# Altium PCB PY32E407Vx_START_ETH.PcbDoc (part 1 of 4)
Units mil, origin at the board's own origin, x right, y up, seen from the top; angles counter-clockwise.
Board outline 5249.65 x 2929.38 mil, 4 copper layers (Top Layer, GND, POWER, Bottom Layer); 253 components, 243 nets, 969 pads, 637 vias.
Unrouted connection lines stored in the file: 88.
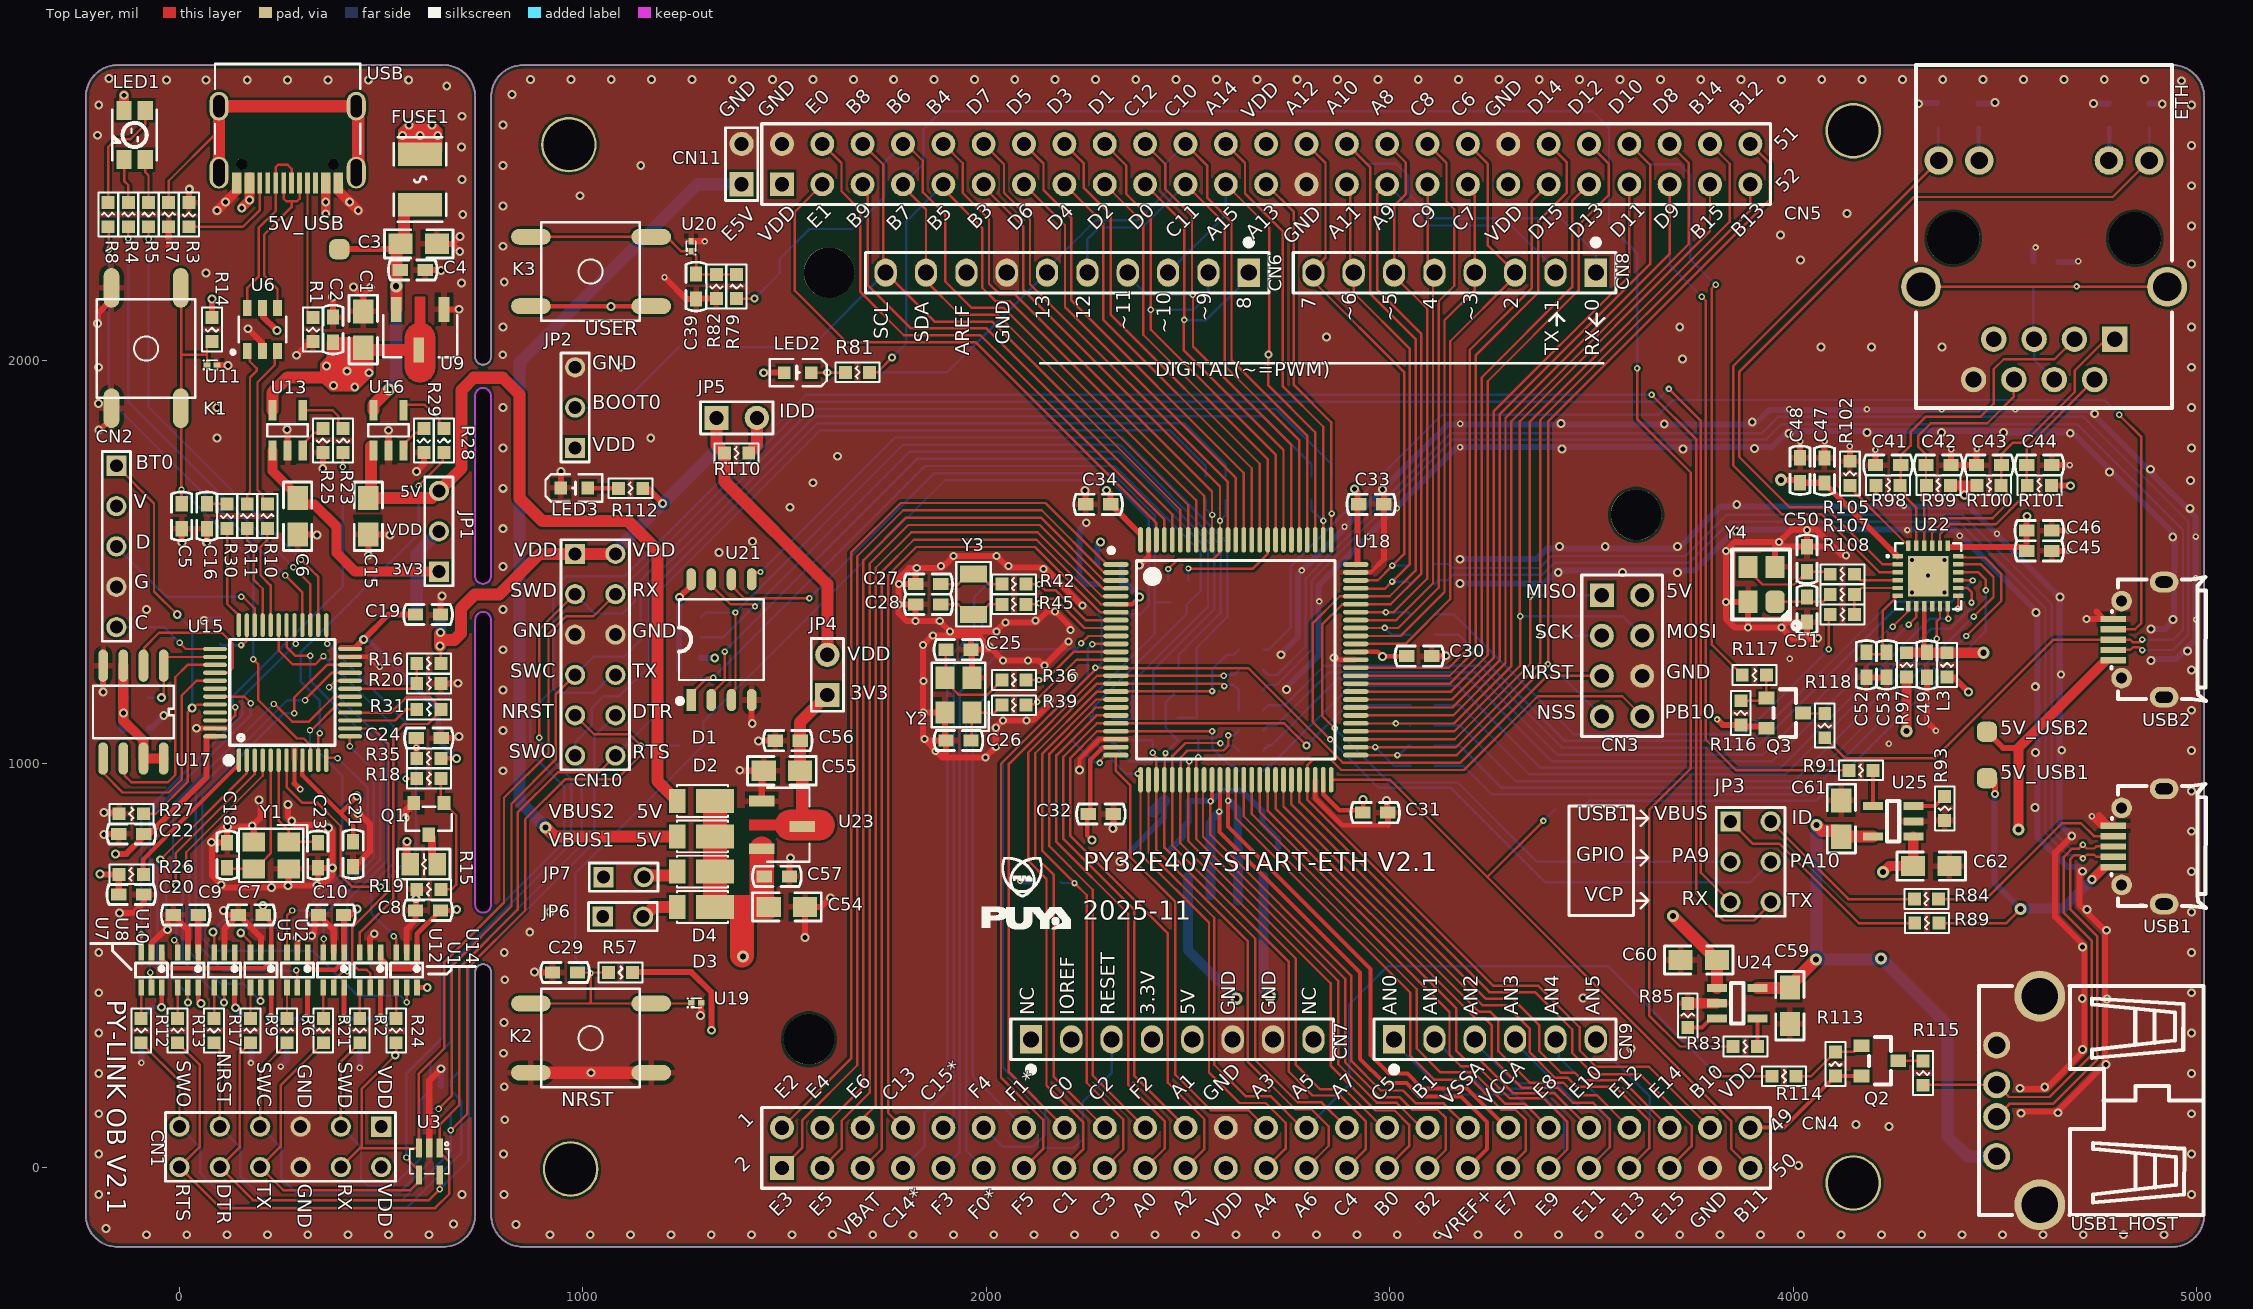
[diagram p0: Top Layer view]
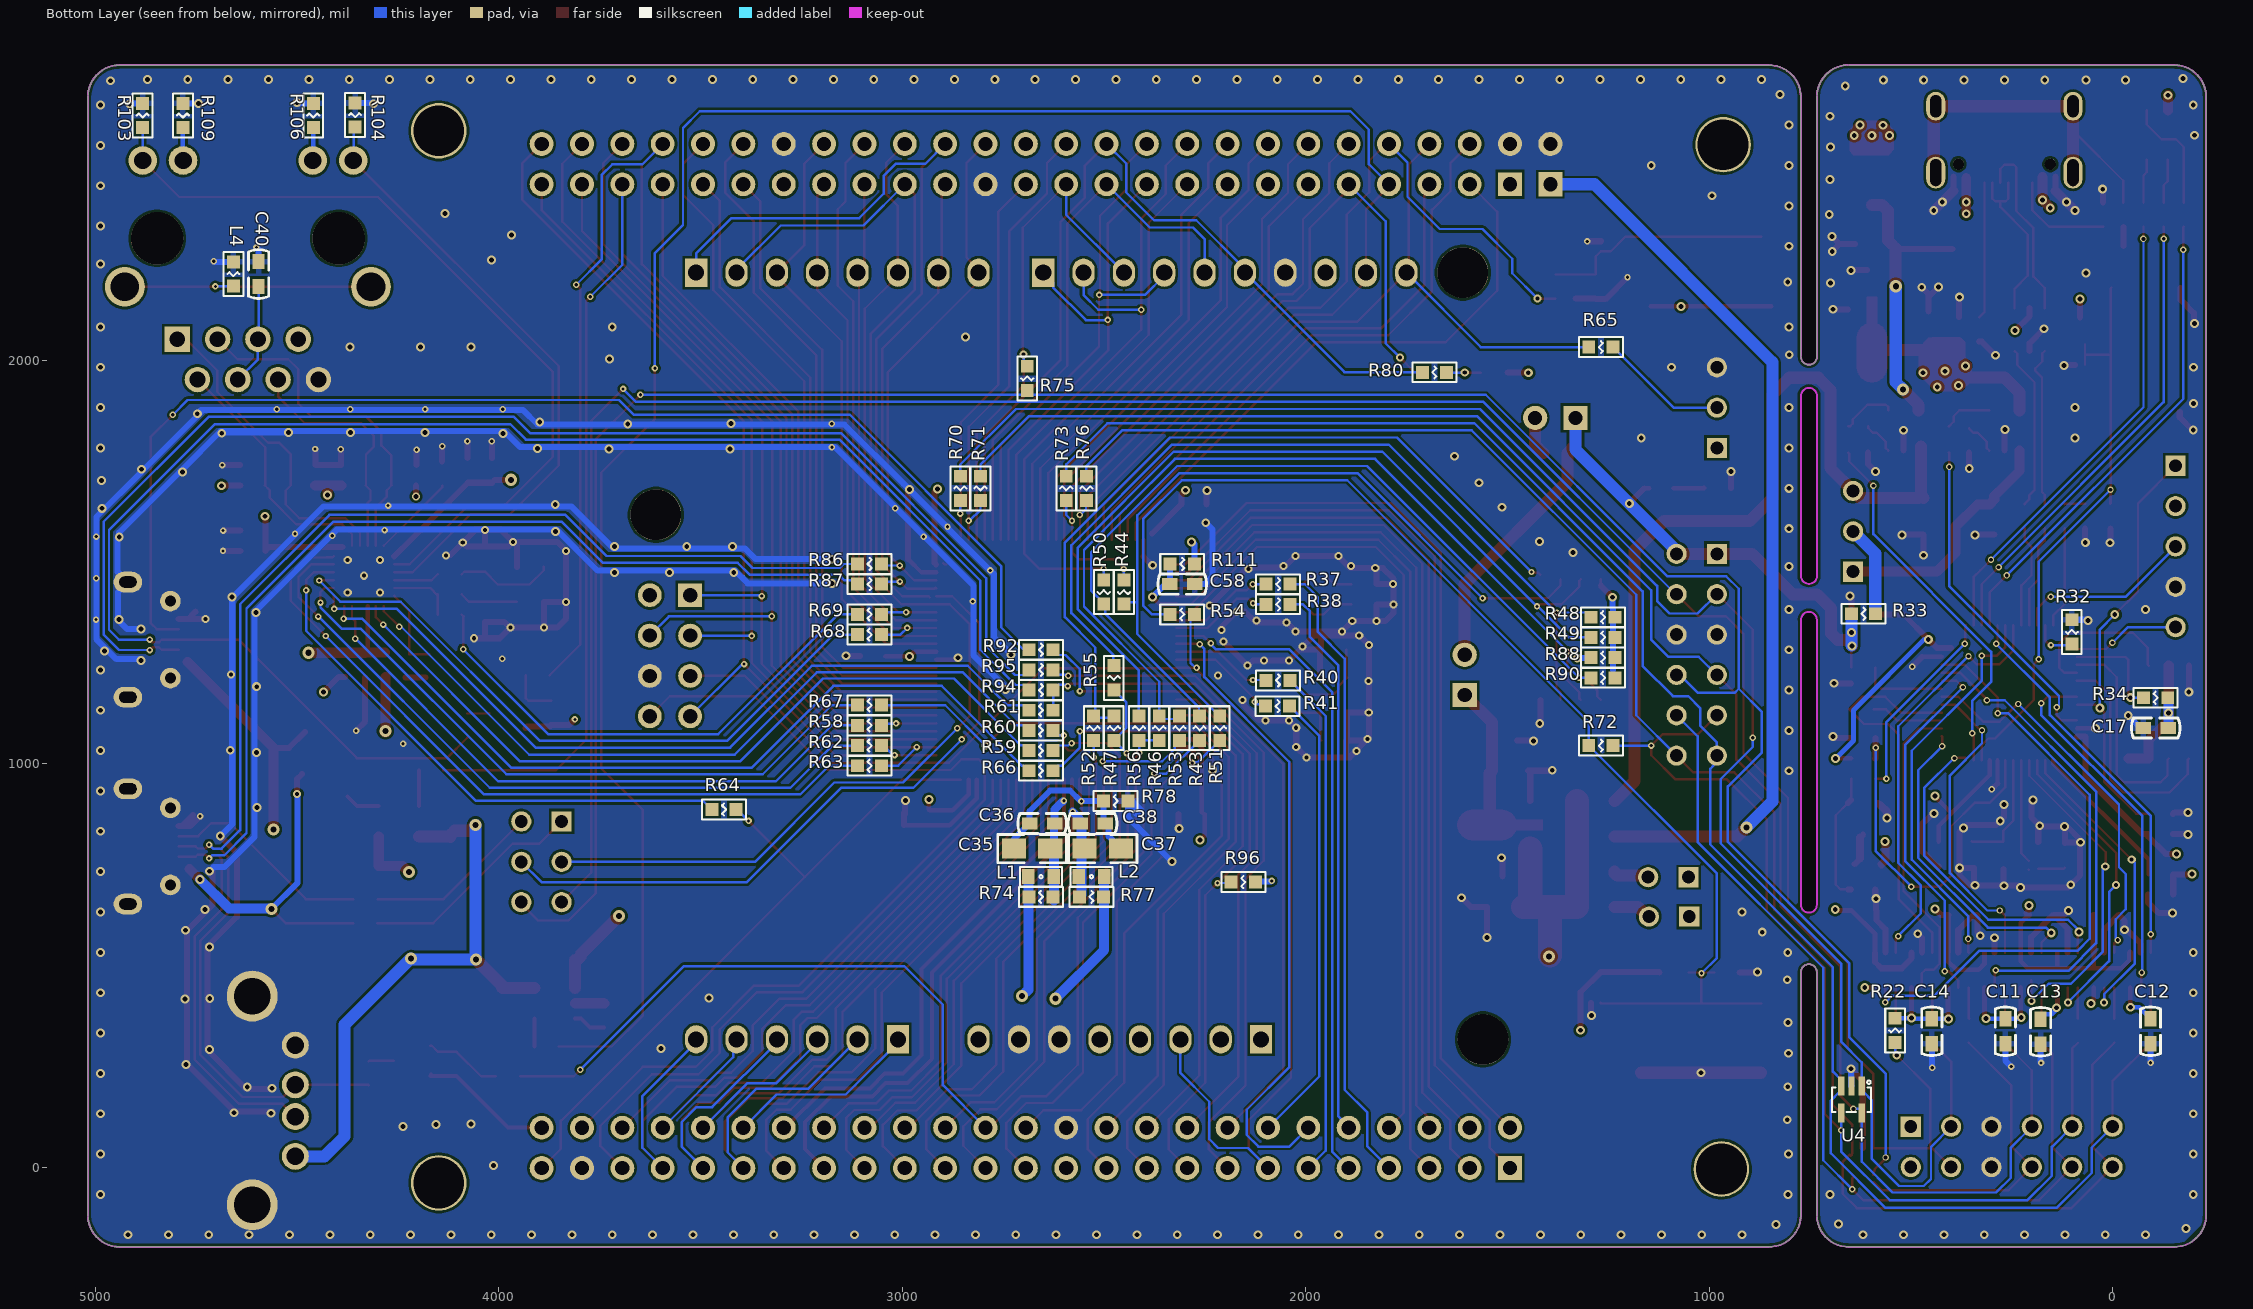
[diagram p1: Bottom Layer view, seen from below]
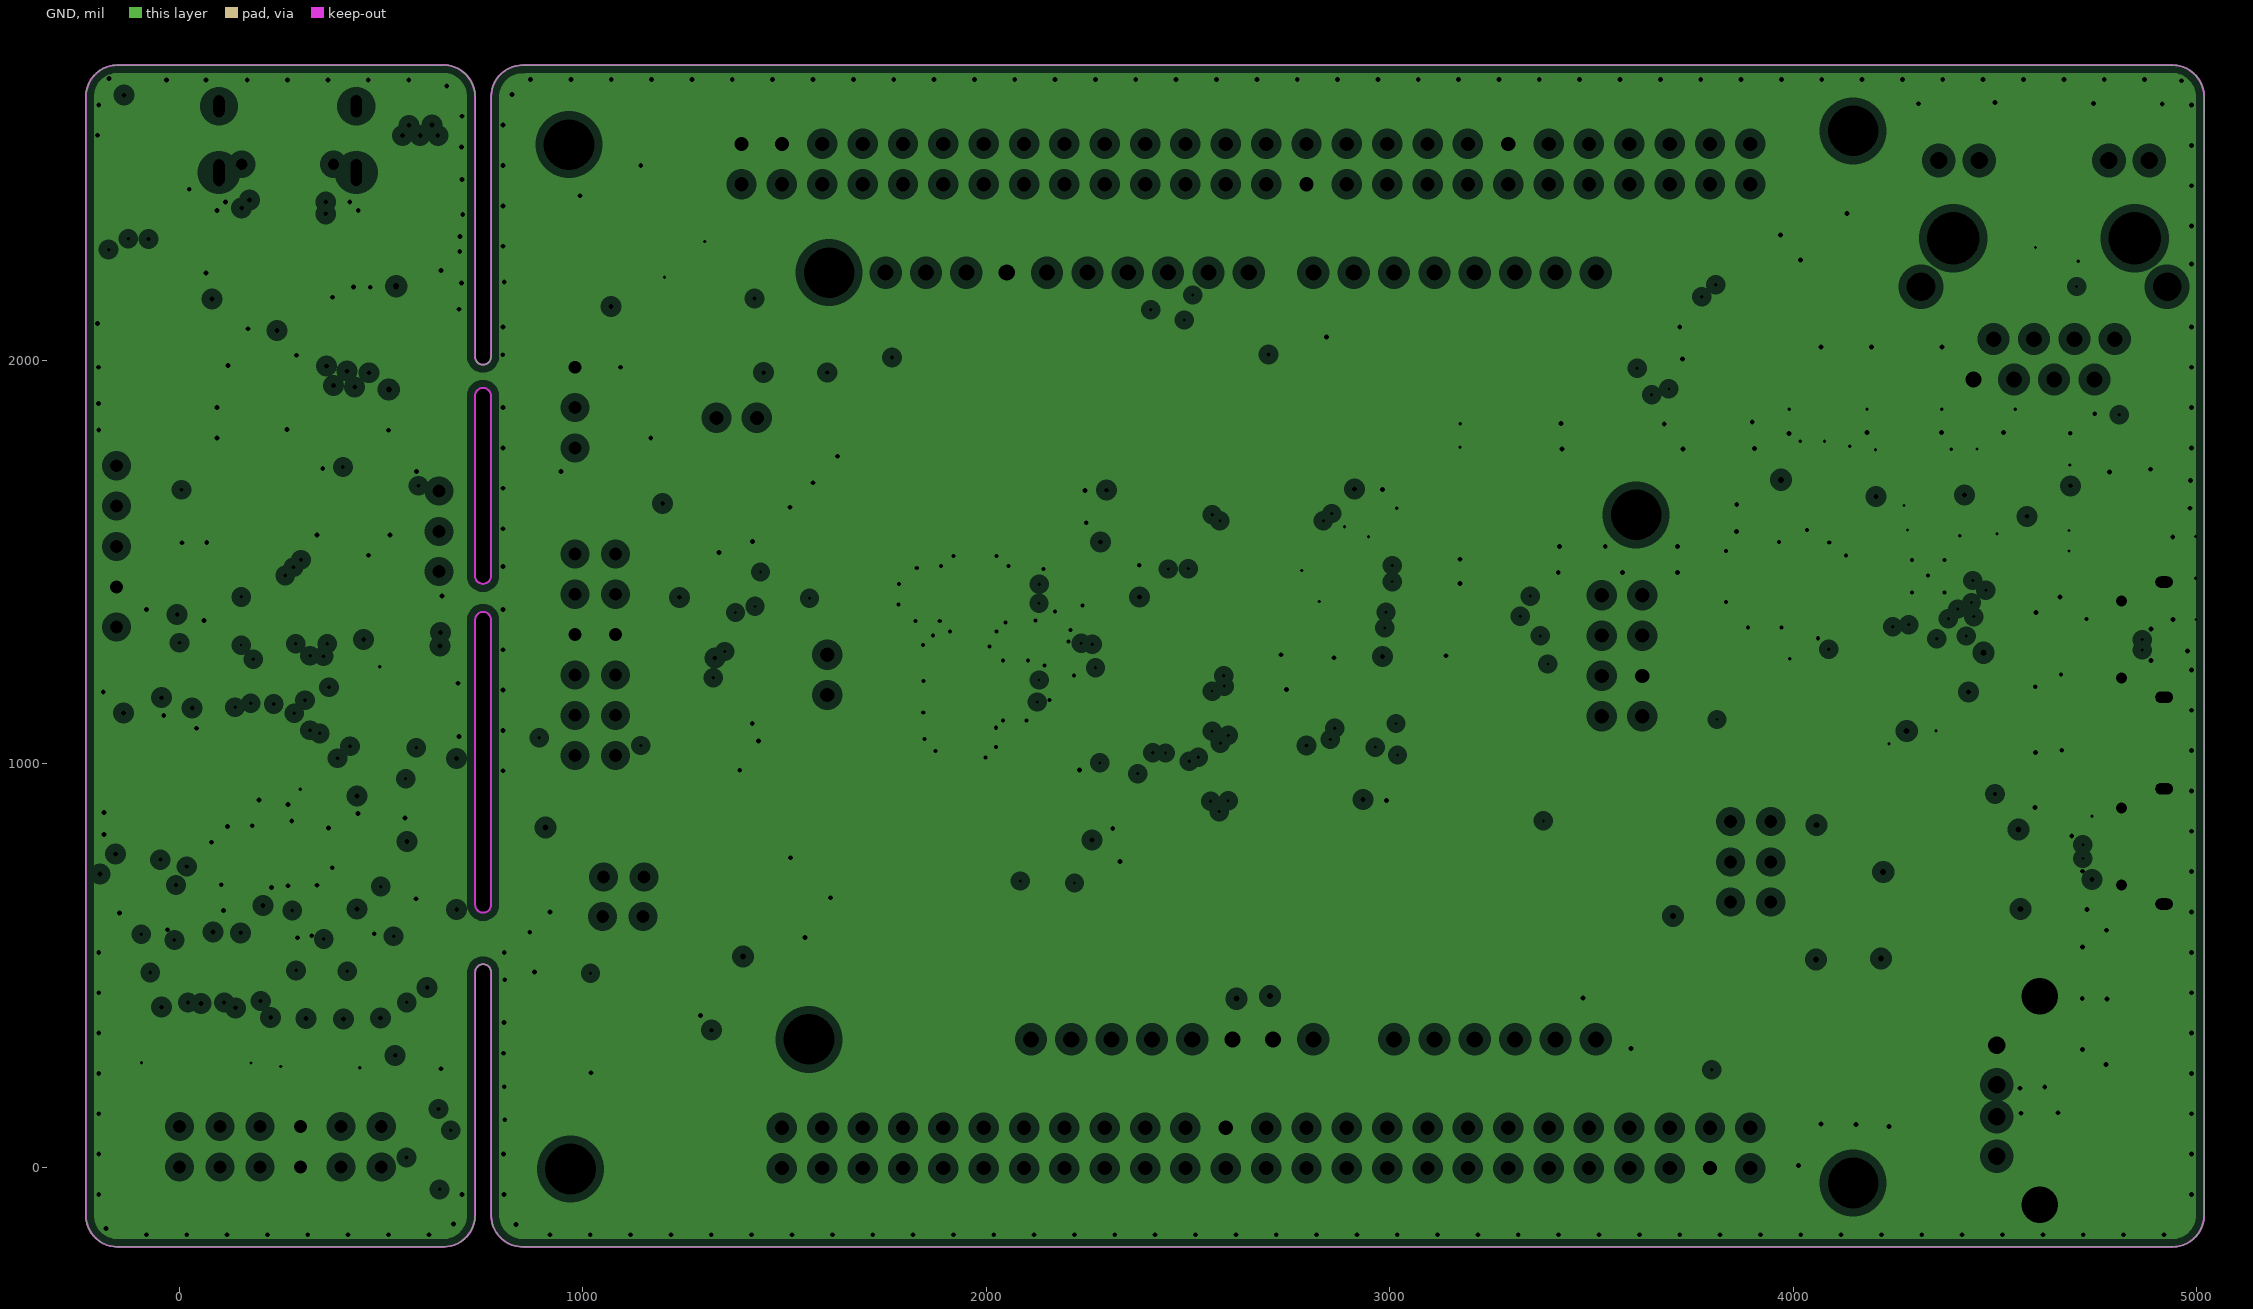
[diagram p2: GND, clearances drawn from the general rule]
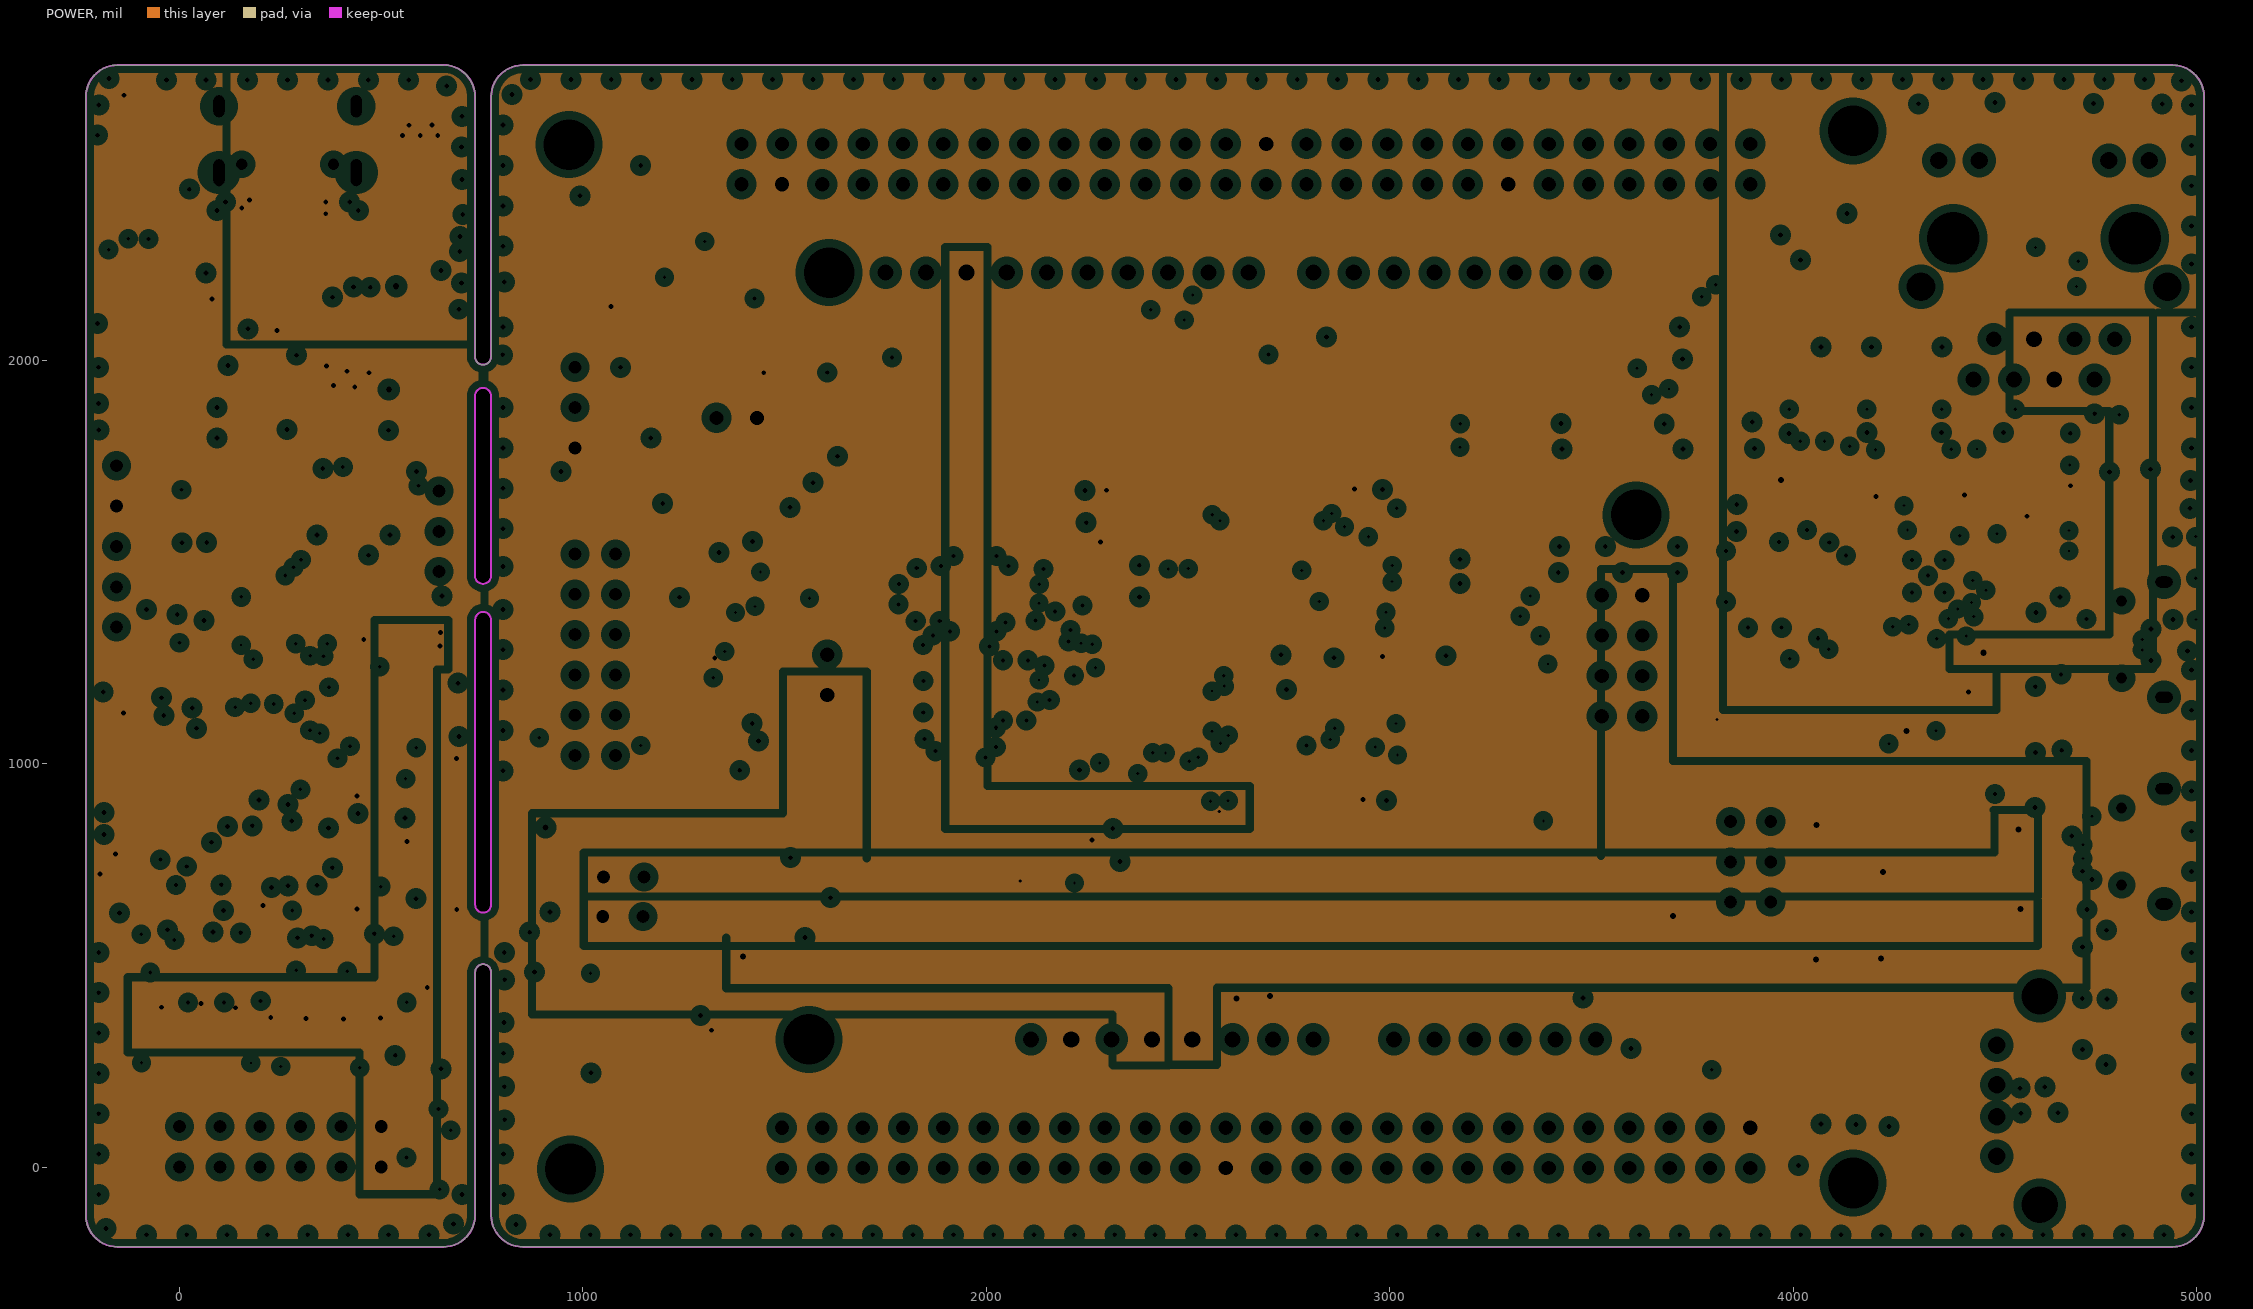
[diagram p3: POWER, clearances drawn from the general rule]

## Layer stack, top to bottom
Top Solder: solder mask 0.4, Solder Resist, Dk 3.5
Top Layer: signal copper 1.4
Dielectric 2: prepreg 12.6, PP-006, Dk 4.1
GND: plane copper 1.378, net GND
Dielectric5: dielectric 12.6, FR-4, Dk 4.8
POWER: plane copper 1.378, net (Multiple Nets)
Dielectric4: dielectric 12.6, FR-4, Dk 4.8
Bottom Layer: signal copper 1.4
Bottom Solder: solder mask 0.4, Solder Resist, Dk 3.5

## Board outline
-153.26,-198 653.78,-198 653.81,-197.97 ccw(c653.81,-119.23) 732.55,-119.23 732.57,-118.95 732.57,483.05 732.92,483.05 cw(c752.61,483.05) 772.29,483.05 772.29,-119.17 772.35,-119.17 ccw(c851.09,-119.17) 851.09,-197.91 851.09,-198 4938.87,-198 ccw(c4938.87,-119.26) 5017.61,-119.26 5017.65,-119.26 5017.65,2652.35 5017.45,2652.35 ccw(c4938.71,2652.35) 4938.71,2731.09 850.95,2731.09 850.95,2730.69 ccw(c850.95,2651.95) 772.21,2651.95 772.21,2008.35 771.94,2008.08 cw(c752.25,2008.08) 732.57,2008.08 732.57,2652.64 ccw(c653.83,2652.64) 653.83,2731.38 653.83,2731.09 -153.26,2731.09 ccw(c-153.26,2652.35) -232,2652.35 -232,-119.26 ccw(c-153.26,-119.26)
cut-out: 732.92,650.05 ccw(c752.61,650.05) 772.29,650.05 771.94,650.05 771.94,1356.05 772.29,1356.05 ccw(c752.61,1356.05) 732.92,1356.05 732.57,1357.05
cut-out: 732.57,1465.05 ccw(c752.25,1465.05) 771.94,1465.05 771.94,1911.05 ccw(c752.25,1911.05) 732.57,1911.05

## Design rules (kind name [scope] priority, off if disabled: settings)
Clearance [All] p1: gap=6 ignorepadtopadclearanceinfootprint=FALSE
ComponentClearance [All] p1 off: gap=10 collisioncheckmode=3 verticalgap=10 showdistances=FALSE
DiffPairsRouting DiffPairsRouting_2 [InDifferentialPair ('USB1')] p1: maxlimit=10 minlimit=10 mostfreqgap=10 toplayer_minwidth=15 toplayer_maxwidth=15 toplayer_prefwidth=15 bottomlayer_minwidth=15 bottomlayer_maxwidth=15 bottomlayer_prefwidth=15 maxuncoupledlength=500
DiffPairsRouting DiffPairsRouting_1 [InDifferentialPairClass('USB')] p2: maxlimit=10 minlimit=10 mostfreqgap=10 toplayer_minwidth=15 toplayer_maxwidth=15 toplayer_prefwidth=15 bottomlayer_minwidth=15 bottomlayer_maxwidth=15 bottomlayer_prefwidth=15 maxuncoupledlength=500
DiffPairsRouting DiffPair_DiffPairsRouting [All] p3: maxlimit=10 minlimit=10 mostfreqgap=10 toplayer_minwidth=15 toplayer_maxwidth=15 toplayer_prefwidth=15 bottomlayer_minwidth=15 bottomlayer_maxwidth=15 bottomlayer_prefwidth=15 maxuncoupledlength=500
DiffPairsRouting [All] p4: maxlimit=10 minlimit=10 mostfreqgap=10 toplayer_minwidth=15 toplayer_maxwidth=15 toplayer_prefwidth=15 bottomlayer_minwidth=15 bottomlayer_maxwidth=15 bottomlayer_prefwidth=15 maxuncoupledlength=500
HoleSize [All] p1: absolutevalues=TRUE maxlimit=300 minlimit=1 maxpercent=80.000 minpercent=20.000
HoleSize Testpoint [All] p2: absolutevalues=TRUE maxlimit=100 minlimit=1 maxpercent=80.000 minpercent=20.000
HoleSize TestPointUsage [All] p3: absolutevalues=TRUE maxlimit=100 minlimit=1 maxpercent=80.000 minpercent=20.000
MinimumSolderMaskSliver [All] p1: minsoldermaskwidth=0
PlaneClearance [All] p1: clearance=20
PlaneConnect [All] p1: planeconnectstyle=Direct reliefexpansion=20 reliefentries=4 reliefconductorwidth=10 reliefairgap=10
PolygonConnect "Polygon VIA" [IsVia] p1: connectstyle=Direct reliefconductorwidth=10 reliefentries=4 polygonreliefangle="90 Angle" airgapwidth=10
PolygonConnect [All] p2: thpad.connectstyle=Direct thpad.reliefconductorwidth=10 thpad.reliefentries=4 thpad.polygonreliefangle="90 Angle" thpad.airgapwidth=10 smdpad.connectstyle=Relief smdpad.reliefconductorwidth=15 smdpad.reliefentries=4 smdpad.polygonreliefangle="90 Angle" smdpad.airgapwidth=10 via.connectstyle=Direct via.reliefconductorwidth=10 via.reliefentries=4 via.polygonreliefangle="90 Angle" via.airgapwidth=10
RoutingVias [All] p1: holewidth=20 width=40 viastyle="Through Hole" minholewidth=20 minwidth=40 maxholewidth=20 maxwidth=40
SilkToSilkClearance [All] p1: silktosilkclearance=0
SilkToSolderMaskClearance [IsPad] p1: minsilkscreentomaskgap=0 clearancetoexposedcopper=TRUE
SolderMaskExpansion [All] p1: expansion=4 istentingtop=FALSE
Width [All] p1: maxlimit=80 minlimit=6 preferedwidth=6
22 further rules are at their usual default settings.

## Classes and differential pairs
component class Designator: C39 C59 C60 C61 C62 K3 LED2 Q2 Q3 R82 R83 R84 R85 R86 R87 R88 R89 R90 R91 R92 R93 R94 R95 R96 R113 R114 R115 R116 R117 R118 U20 U21 U24 U25 USB1 USB1_HOST USB2
net class PF[0..5]: PF0 PF1 PF2 PF3 PF4 PF5
net class PE[0..15]: PE0 PE1 PE2 PE3 PE4 PE5 PE6 PE7 PE8 PE9 PE10 PE11 PE12 PE13 PE14 PE15
net class PD[0..15]: PD0 PD1 PD2 PD3 PD4 PD5 PD6 PD7 PD8 PD9 PD10 PD11 PD12 PD13 PD14 PD15
net class PC[0..15]: PC0 PC1 PC2 PC3 PC4 PC5 PC6 PC7 PC8 PC9 PC10 PC11 PC12 PC13 PC14 PC15
net class PB[0..15]: PB0 PB1 PB2 PB3 PB4 PB5 PB6 PB7 PB8 PB9 PB10 PB11 PB12 PB13 PB14 PB15
net class PA[0..15]: PA0 PA1 PA2 PA3 PA4 PA5 PA6 PA7 PA8 PA9 PA10 PA11 PA12 PA13 PA14 PA15

## Components (designator, comment, footprint, x,y, rotation, side; value= is the part's Value field where it differs from the comment)
5V_USB "TP_SIN" TP_SIN 396.1,2274.79 r0 top
5V_USB1 "TP_SIN" TP_SIN 4479.3,963.69 r0 top
5V_USB2 "TP_SIN" TP_SIN 4479.3,1078.69 r0 top
C1 "10uF" C0805 455.5,2075.5 r270 top
C2 "100nF" C0603 380.5,2075.5 r270 top
C3 "10uF" C0805 593,2288 r180 top
C4 "100nF" C0603 578.1,2223.2 r180 top
C5 "100nF" C0603 5.5,1613 r90 top
C6 "10uF" C0805 293,1613 r90 top
C7 "100nF" C0603 176.6,624.9 r0 top value=104
C8 "100nF" C0603 616,636.09 r0 top value=104
C9 "100nF" C0603 15.3,624.9 r0 top value=104
C10 "100nF" C0603 375.5,624.9 r0 top value=104
C11 "100nF" C0603 265.7,336.7 r90 bottom value=104
C12 "100nF" C0603 -94.3,336.6 r90 bottom value=104
C13 "100nF" C0603 178.2,335.3 r90 bottom value=104
C14 "100nF" C0603 447.9,336.7 r90 bottom value=104
C15 "10uF" C0805 468,1613 r90 top
C16 "100nF" C0603 68,1613 r90 top
C17 "100nF" C0603 -107,1088 r180 bottom value=104
C18 "22pF" C0603 118,772.6 r270 top
C19 "100nF" C0603 616,1369.3 r180 top value=104
C20 "100nF" C0603 -119.5,675.5 r180 top value=104
C21 "100nF" C0603 430.5,775.5 r90 top value=104
C22 "100nF" C0603 -119.5,825.5 r0 top value=104
C23 "22pF" C0603 343,772.6 r90 top
C24 "100nF" C0603 618,1063 r180 top value=104
C25 "22pF" C0603 1930.5,1282.09 r180 top
C26 "22pF" C0603 1930.5,1057.09 r0 top
C27 "22pF" C0603 1855.5,1444.59 r0 top
C28 "22pF" C0603 1855.5,1394.59 r0 top
C29 "100nF" C0603 955.5,482.09 r0 top
C30 "100nF" C0603 3072.8,1266.29 r180 top
C31 "100nF" C0603 2963.61,878.2 r180 top
C32 "100nF" C0603 2283.54,875.01 r180 top
C33 "100nF" C0603 2953.6,1642.49 r180 top
C34 "100nF" C0603 2276.7,1642.49 r0 top
C35 "1uF" C0805 2677.6,789.09 r180 bottom
C36 "100nF" C0603 2652.6,851.59 r180 bottom
C37 "1uF" C0805 2502.6,789.09 r0 bottom
C38 "100nF" C0603 2527.6,851.59 r0 bottom
C39 "100nF" C0603 1280.5,2182.09 r90 top
C40 "100nF" C0603 4594.5,2213.09 r270 bottom
C41 "NC/10pF" C0603 4234.4,1739.59 r0 top
C42 "NC/10pF" C0603 4359.4,1739.59 r180 top
C43 "NC/10pF" C0603 4484.4,1739.59 r0 top
C44 "NC/10pF" C0603 4609.4,1739.59 r180 top
C45 "100nF" C0603 4609,1527.09 r180 top
C46 "100nF" C0603 4609,1577.09 r180 top
C47 "10uF" C0603 4076.7,1726.19 r270 top
C48 "100nF" C0603 4016.2,1726.89 r270 top
C49 "100nF" C0603 4330.5,1244.59 r90 top
C50 "22pF" C0603 4033.5,1506.59 r90 top
C51 "22pF" C0603 4033.5,1381.59 r90 top
C52 "10uF" C0603 4180.5,1244.59 r90 top
C53 "100nF" C0603 4230.5,1244.59 r90 top
C54 "10uF" C0805 1505.5,644.59 r180 top
C55 "10uF" C0805 1493,982.09 r0 top
C56 "0.1uF/50V" C0603CAP 1476.4,1056.59 r90 top
C57 "0.1uF/50V" C0603CAP 1511.6,720.29 r270 top value=2.2uF
C58 "100nF" C0603 2305.5,1444.59 r0 bottom
C59 "10uF" C0805 3991.1,399.85 r90 top
C60 "10uF" C0805 3765.2,513.11 r0 top
C61 "10uF" C0805 4118.51,863.52 r270 top
C62 "10uF" C0805 4341.44,745.74 r180 top
CN1 "CON6x2" CON6X2 500,0 r270 top locked
CN2 "CON5" CON5 -156.37,1737.99 r270 top
CN3 "Header 4X2" HDR2X4 3525.12,1417.14 r270 top locked
CN4 "Header 25X2" HDR2X25 1493.11,-2.45 r0 top locked
CN5 "Header 25X2" HDR2X25 1493.11,2435.55 r0 top locked
CN6 "Header 10" 1*10P_FEMALE 2650.11,2216.55 r180 top locked
CN7 "Header 8" 1*8P_FEMALE 2110.11,316.55 r0 top locked
CN8 "Header 8" 1*8P_FEMALE 3510.11,2216.55 r180 top locked
CN9 "Header 6" 1*6P_FEMALE 3010.11,316.55 r0 top locked
CN10 "CON6x2" CON6X2 1080.5,1519.59 r0 top locked
CN11 "CON2" CON2#1 1393.11,2435.55 r90 top locked
D1 "DFLS130L-7" POWERDI-123_L2.8-W1.8-LS3.7-RD 1280.5,907.09 r180 top
D2 "DFLS130L-7" POWERDI-123_L2.8-W1.8-LS3.7-RD 1280.5,819.59 r180 top
D3 "DFLS130L-7" POWERDI-123_L2.8-W1.8-LS3.7-RD 1280.5,644.59 r180 top
D4 "DFLS130L-7" POWERDI-123_L2.8-W1.8-LS3.7-RD 1280.5,732.09 r180 top
ETH "HR911105A" RJ45-TH_HR911105A 4621,2223.09 r180 top locked
FUSE1 "BSMD1206-050-6V" SDM1210P005TF 618,2450.5 r270 top
JP1 "CON3" CON3 643,1475.5 r90 top
JP2 "CON3" CON3 980.5,1782.09 r90 top
JP3 "CON3x2" CON3x2 3943.61,856.41 r0 top
JP4 "CON2" CON2#1 1605.5,1169.59 r90 top
JP5 "CON2/NC" CON2#1 1330.89,1856.71 r0 top
JP6 "CON2" CON2#2 1048.91,620.65 r0 top
JP7 "CON2" CON2#2 1050.73,718.4 r0 top
K1 "1TS002B-2600-5001_key" SWITCH -82.91,2027.71 r90 top
K2 "1TS002B-2600-5001_key" SWITCH 1018,319.59 r0 top locked
K3 "1TS002B-2600-5001_key" SWITCH 1018,2219.59 r0 top locked
L1 "BEAD" L0603 2655.5,719.59 r180 bottom value=600R@100MHz
L2 "BEAD" L0603 2530.5,719.59 r0 bottom value=600R@100MHz
L3 "330@100MHz" R0603 4380.5,1244.59 r90 top
L4 "330@100MHz" R0603 4657,2213.09 r270 bottom
LED1 "MHPA3528RGBCT" LED-ARRAY-SMD_4P-L3.5-W2.8-TL -111.13,2557.84 r90 top
LED2 "GREEN" 0603_LED 1518,1969.59 r180 top
LED3 "RED" 0603_LED 993,1682.09 r0 top
Q1 "2302" SOT23 618,863 r0 top value=SI2302
Q2 "2301" "SOT23 2301" 4169,300.5 r180 top value=SI2301
Q3 "2301" "SOT23 2301" 3932.87,1162.45 r180 top value=SI2301
R1 "5.1K" R0603 330.5,2075.5 r90 top
R2 "27R" R0603 446.71,338 r270 top
R3 "5.1K" R0603 23.28,2360.25 r90 top
R4 "680R" R0603 -126.72,2360.25 r270 top
R5 "680R" R0603 -76.72,2360.25 r270 top
R6 "27R" R0603 266.14,338 r270 top
R7 "1M" R0603 -26.72,2360.25 r270 top
R8 "680R" R0603 -176.72,2360.25 r270 top
R9 "27R" R0603 175.86,338 r270 top
R10 "27R" R0603 218,1613 r270 top
R11 "27R" R0603 168,1613 r270 top
R12 "27R" R0603 -95,338 r270 top
R13 "27R" R0603 -4.71,338 r270 top
R14 "10K" R0603 80.5,2075.5 r90 top
R15 "100R" R0805 605.5,750.5 r180 top
R16 "20K" R0603 618,1248 r0 top
R17 "27R" R0603 85.57,338 r270 top
R18 "100R" R0603 618,963 r180 top
R19 "100K" R0603 618,688 r0 top
R20 "10K" R0603 618,1198 r180 top
R21 "27R" R0603 356.43,338 r270 top
R22 "4.7K" R0603 538.7,338.7 r90 bottom
R23 "4.7K" R0603 405.5,1800.5 r90 top
R24 "27R" R0603 537,338 r270 top
R25 "16K" R0603 355.5,1800.5 r90 top
R26 "0R" R0603 -119.5,725.5 r0 top
R27 "10K" R0603 -119.5,875.5 r180 top
R28 "4.7K" R0603 655.5,1800.5 r90 top
R29 "16K" R0603 605.5,1800.5 r90 top
R30 "0R" R0603 118,1613 r90 top
R31 "680R" R0603 618,1134.09 r180 top
R32 "0R" R0603 100.8,1326.39 r90 bottom
R33 "0R" R0603 617.1,1371.3 r0 bottom
R34 "100K" R0603 -107,1163 r180 bottom
R35 "10K" R0603 618,1013 r0 top
R36 "0R" R0603 2068,1207.09 r0 top
R37 "0R" R0603 2068,1444.59 r0 bottom
R38 "0R" R0603 2068,1394.59 r0 bottom
R39 "0R" R0603 2068,1144.59 r0 top
R40 "0R" R0603 2068.2,1205.99 r0 bottom
R41 "0R" R0603 2069.3,1142.19 r0 bottom
R42 "0R" R0603 2068,1444.59 r0 top
R43 "0R/NC" R0603 2262.5,1087.5 r270 bottom
R44 "0R/NC" R0603 2450,1425 r90 bottom
R45 "0R" R0603 2068,1394.59 r0 top
R46 "0R/NC" R0603 2362.5,1087.5 r270 bottom
R47 "0R/NC" R0603 2475,1087.5 r270 bottom
R48 "0R/NC" R0603 1262.5,1362.5 r180 bottom
R49 "0R/NC" R0603 1262.5,1312.5 r180 bottom
R50 "0R" R0603 2500,1425 r90 bottom
R51 "0R" R0603 2212.5,1087.5 r270 bottom
R52 "0R" R0603 2525,1087.5 r270 bottom
R53 "0R" R0603 2312.5,1087.5 r270 bottom
R54 "0R" R0603 2305.5,1369.59 r180 bottom
R55 "0R" R0603 2475,1212.5 r270 bottom
R56 "0R" R0603 2412.5,1087.5 r270 bottom
R57 "10K" R0603 1093,482.09 r180 top
R58 "0R" R0603 3080.5,1094.59 r180 bottom
R59 "0R" R0603 2655.5,1032.09 r180 bottom
R60 "0R" R0603 2655.5,1082.09 r180 bottom
R61 "0R" R0603 2655.5,1132.09 r180 bottom
R62 "0R" R0603 3080.5,1044.59 r180 bottom
R63 "0R" R0603 3080.5,994.59 r180 bottom
R64 "0R" R0603 3441.05,886.09 r180 bottom
R65 "10K" R0603 1268,2032.09 r0 bottom
R66 "0R" R0603 2655.5,982.09 r180 bottom
R67 "0R" R0603 3080.5,1144.59 r180 bottom
R68 "0R" R0603 3080.5,1319.59 r180 bottom
R69 "0R" R0603 3080.5,1369.59 r180 bottom
R70 "100R" R0603 2855.5,1682.09 r270 bottom
R71 "100R" R0603 2805.5,1682.09 r270 bottom
R72 "0R" R0603 1268,1044.59 r0 bottom
R73 "0R" R0603 2593,1682.09 r270 bottom
R74 "0R/NC" R0603 2655.5,669.59 r180 bottom
R75 "0R" R0603 2689.6,1954.69 r90 bottom
R76 "0R" R0603 2543,1682.09 r270 bottom
R77 "0R/NC" R0603 2530.5,669.59 r0 bottom
R78 "0R" R0603 2470.4,907.19 r180 bottom
R79 "0R" R0603 1380.5,2182.09 r270 top
R80 "680R/NC" R0603 1680.5,1969.59 r0 bottom
R81 "680R" R0603 1680.5,1969.59 r0 top
R82 "1.5K" R0603 1330.5,2182.09 r90 top
R83 "4.7K" R0603 3880.54,298.78 r0 top
R84 "1K" R0603 4329.46,664.12 r0 top
R85 "16K" R0603 3738.01,375.81 r270 top
R86 "22R" R0603 3080.5,1494.59 r0 bottom
R87 "22R" R0603 3080.5,1444.59 r0 bottom
R88 "0R" R0603 1262.5,1262.5 r180 bottom
R89 "10K" R0603 4330.5,604.63 r0 top
R90 "100K" R0603 1262.5,1212.5 r180 bottom
R91 "4.7K" R0603 4167.5,983.13 r0 top
R92 "1K" R0603 2655.5,1282.09 r0 bottom
R93 "16K" R0603 4374.65,888.83 r90 top
R94 "22R" R0603 2655.5,1182.09 r0 bottom
R95 "22R" R0603 2655.5,1232.09 r0 bottom
R96 "10K" R0603 2154.2,706.19 r180 bottom
R97 "0R" RES0603 4280.5,1244.59 r90 top
R98 "49.9R" R0603 4234.4,1689.59 r180 top
R99 "49.9R" R0603 4359.4,1689.59 r0 top
R100 "49.9R" R0603 4484.4,1689.59 r180 top
R101 "49.9R" R0603 4609.4,1689.59 r0 top
R102 "12.1K" R0603 4139.7,1719.09 r90 top
R103 "4.7K" R0603 4882,2606.09 r270 bottom
R104 "4.7K" R0603 4355.5,2607.09 r270 bottom
R105 "0R" R0603 4121,1469.09 r0 top
R106 "270" R0603 4459,2606.09 r270 bottom
R107 "0R" R0603 4121,1419.09 r0 top
R108 "0R" R0603 4121,1369.09 r180 top
R109 "270" R0603 4782,2606.09 r270 bottom
R110 "0R" R0603 1380.89,1769.21 r0 top
R111 "0R" R0603 2305.5,1494.59 r0 bottom
R112 "680R" R0603 1118,1682.09 r0 top
R113 "100K" R0603 4103.98,255.46 r90 top
R114 "100" R0603 3976.49,224.94 r180 top
R115 "1.5K" R0603 4321.23,232.64 r90 top
R116 "100K" R0603 3869.41,1125.67 r90 top
R117 "100" R0603 3902.98,1219.26 r180 top
R118 "1.5K" R0603 4077.51,1094 r90 top
U1 "74LVC1T45DW" SOT363 472.69,488.04 r180 top
U2 "74LVC1T45DW" SOT363 292,488.04 r180 top
U3 "ESD_6V1" ESD_SOT323-5L 619,14 r180 top value=ESDALC6V1W5
U4 "ESD_6V1" ESD_SOT323-5L 647,167 r0 bottom value=ESDALC6V1W5
U5 "74LVC1T45DW" SOT363 201.66,488.04 r180 top
U6 "USBLC6-2SC6" SOT23-6 205.5,2075.5 r180 top
U7 "74LVC1T45DW" SOT363 -69.37,488.04 r180 top
U8 "74LVC1T45DW" SOT363 20.97,488.04 r180 top
U9 "LM1117-3.3" LM1117-3.3 655.5,2125.5 r90 top
U10 "74LVC1T45DW" SOT363 111.31,488.04 r180 top
U11 "ESD-TRANSIL" ESD_ST0201 80.5,1988 r0 top value=ESDALC6V1-1U2
U12 "74LVC1T45DW" SOT363 382.34,488.04 r180 top
U13 "MT9700" SOT23-5 268,1825.5 r0 top
U14 "74LVC1T45DW" SOT363 563.03,488.04 r180 top
U15 "PY32F403C1xT" LQFP-48_L7.0-W7.0-P0.50-LS9.0-BL 255.5,1175.69 r0 top locked
U16 "MT9700" SOT23-5 518,1825.5 r0 top
U17 "P25Q64H" SOP-8P -114.3,1127.5 r180 top value=SST25VF020B
U18 "PY32E407Vx" LQFP-100_L14.0-W14.0-P0.50-LS16.0-BL 2618,1257.09 r270 top locked
U19 "ESD-TRANSIL" ESD_ST0201 1280.5,407.09 r0 top value=ESDALC6V1-1U2
U20 "ESD-TRANSIL" ESD_ST0201 1268,2282.09 r90 top value=ESDALC6V1-1U2
U21 "P25Q128H" SOP8W_L 1343,1307.09 r90 top locked
U22 "LAN8720A-CP-TR" QFN-24_L4.0-W4.0-P0.50-BL-EP2.6 4333.5,1464.59 r270 top
U23 "LM1117-3.3" LM1117-3.3 1443,907.09 r180 top
U24 "MT9700" SOT23-5 3860.58,405.96 r270 top
U25 "MT9700" SOT23-5 4247.07,856.86 r90 top
USB "KH-TYPE-C-16P" USB-C-SMD_KH-TYPE-C-16P 268,2534 r180 top
USB1 "Micro-B" MICRO-USB-SMD_MICROXNJ 4855.5,794.59 r90 top locked
USB1_HOST "Type-A" USB-A-TH_AF-WJDG 4557,165.09 r90 top locked
USB2 "Micro-B" MICRO-USB-SMD_MICROXNJ 4855.5,1307.09 r90 top locked
Y1 "24MHz" CRYSTAL-SMD_4P-L3.2-W2.5-BL 227.3,772.6 r180 top
Y2 "24MHz" CRYSTAL-SMD_4P-L3.2-W2.5-BL 1930.5,1169.59 r90 top
Y3 "32.768KHz" CRYSTAL-SMD_L3.2-W1.5-1 1968,1419.59 r90 top value=32.768kHz
Y4 "25MHz" SMD-3225_4P 3921,1444.09 r90 top

## Footprints (in the part's own frame and the unit in brackets; to place one, negate y for a bottom-side part, rotate by r counter-clockwise, add the part's x,y. Pads: shape width x height; smd on the part's side, far side on the other; paste and mask are expansions set on the pad)
1*6P_FEMALE [mil]
  rect 55x70 hole 40: 1(0,0)
  oval 55x70 hole 40: 2(100,0) 3(200,0) 4(300,0) 5(400,0) 6(500,0)
  silkscreen extent -50,-82 550,50
1*8P_FEMALE [mil]
  rect 55x70 hole 40: 1(0,0)
  oval 55x70 hole 40: 2(100,0) 3(200,0) 4(300,0) 5(400,0) 6(500,0) 7(600,0) 8(700,0)
  silkscreen extent -50,-82 750,50
1*10P_FEMALE [mil]
  rect 55x70 hole 40: 1(0,0)
  oval 55x70 hole 40: 2(100,0) 3(200,0) 4(300,0) 5(400,0) 6(500,0) 7(600,0) 8(700,0) 9(800,0) 10(900,0)
  silkscreen extent -50,-82 950,50
0603_LED [mil]
  rect 31.5x31.5 smd: 1(19,1) 2(-48,1)
  silkscreen extent -86,-33 55,35
C0603 [mil]
  rect 38x30 smd: 1(-31,0) 2(31,0)
  silkscreen extent -60,-25 60,25
C0603CAP [mil]
  rect 30x38 smd: 1(0,0) 2(0,-62)
  silkscreen extent -25,-91 25,29
C0805 [mil]
  rect 60x50 smd: 1(-45,0) 2(45,0)
  silkscreen extent -85,-35 85,35
CON2#1 [mil]
  rect 60x60 hole 35: 1(0,0)
  round 60 hole 35: 2(100,0)
  silkscreen extent -40,-40 140,40
CON2#2 [mil]
  rect 50x50 hole 32: 1(0,0)
  round 50 hole 32: 2(100,0)
  silkscreen extent -35,-35 135,35
CON3 [mil]
  rect 50x50 hole 32: 1(0,0)
  round 50 hole 32: 2(100,0) 3(200,0)
  silkscreen extent -35,-35 235,35
CON3x2 [mil]
  rect 50x50 hole 32: 1(-100,0)
  round 50 hole 32: 2(0,0) 3(-100,-100) 4(0,-100) 5(-100,-200) 6(0,-200)
  silkscreen extent -135,-235 35,35
CON5 [mil]
  rect 50x50 hole 32: 1(0,0)
  round 50 hole 32: 2(100,0) 3(200,0) 4(300,0) 5(400,0)
  silkscreen extent -35,-35 435,35
CON6X2 [mil]
  rect 50x50 hole 32: 1(-100,0)
  round 50 hole 32: 2(0,0) 3(-100,-100) 4(0,-100) 5(-100,-200) 6(0,-200) 7(-100,-300) 8(0,-300) 9(-100,-400) 10(0,-400) 11(-100,-500) 12(0,-500)
  silkscreen extent -135,-535 35,35
CRYSTAL-SMD_4P-L3.2-W2.5-BL [mm]
  rect 1.4x1.2 smd: 1(-1.1,-0.85) 2(1.1,-0.85) 3(1.1,0.85) 4(-1.1,0.85)
  silkscreen extent -2.26,-1.91 2.03,1.68
CRYSTAL-SMD_L3.2-W1.5-1 [mm]
  rect 1.05x1.7 smd: 1(-1.275,0) 2(1.275,0)
  silkscreen extent -2.03,-1.08 2.03,1.08
ESD_SOT323-5L [mm]
  rect 0.4x1.2 smd mask+0.05: 1(-0.65,-0.85) 2(0,-0.85) 3(0.65,-0.85) 4(0.65,0.85) 5(-0.65,0.85)
  silkscreen extent -1.23,-1.21 1.23,0.77, body extent -1.15,-1.05 1.15,1.05, height 1.1
ESD_ST0201 [mm]
  rect 0.425x0.33 smd mask+0.05: 1(-0.312,0) 2(0.312,0)
  silkscreen extent -0.55,-0.3 0.33,0.3, body extent -0.34,-0.18 0.34,0.18, height 0.34
HDR2X4 [mm] "Connector; Header; 4x2 Position"
  rect 1.5x1.5 hole 0.9: 1(0,0)
  round 1.5 hole 0.9: 2(0,2.54) 3(2.54,0) 4(2.54,2.54) 5(5.08,0) 6(5.08,2.54) 7(7.62,0) 8(7.62,2.54)
  silkscreen extent -1.27,-1.27 8.89,3.81
HDR2X25 [mm] "Connector; Header; 25x2 Position"
  rect 1.5x1.5 hole 0.9: 1(0,0)
  round 1.5 hole 0.9: 2(0,2.54) 3(2.54,0) 4(2.54,2.54) 5(5.08,0) 6(5.08,2.54) 7(7.62,0) 8(7.62,2.54) 9(10.16,0) 10(10.16,2.54) 11(12.7,0) 12(12.7,2.54) 13(15.24,0) 14(15.24,2.54) 15(17.78,0) 16(17.78,2.54) 17(20.32,0) 18(20.32,2.54) 19(22.86,0) 20(22.86,2.54) 21(25.4,0) 22(25.4,2.54) 23(27.94,0) 24(27.94,2.54) 25(30.48,0) 26(30.48,2.54) 27(33.02,0) 28(33.02,2.54) 29(35.56,0) 30(35.56,2.54) 31(38.1,0) 32(38.1,2.54) 33(40.64,0) 34(40.64,2.54) 35(43.18,0) 36(43.18,2.54) 37(45.72,0) 38(45.72,2.54) 39(48.26,0) 40(48.26,2.54) 41(50.8,0) 42(50.8,2.54) 43(53.34,0) 44(53.34,2.54) 45(55.88,0) 46(55.88,2.54) 47(58.42,0) 48(58.42,2.54) 49(60.96,0) 50(60.96,2.54)
  silkscreen extent -1.27,-1.27 62.23,3.81
L0603 [mm]
  rect 0.8x0.95 smd mask+0.05: 1(-0.8,0) 2(0.8,0)
  silkscreen extent -1.33,-0.6 1.33,0.6, body extent -0.87,-0.47 0.87,0.47, height 0.95
LED-ARRAY-SMD_4P-L3.5-W2.8-TL [mm]
  rect 1.2x0.95 smd: 1(1.55,0.665) 2(1.55,-0.665) 3(-1.55,-0.665) 4(-1.55,0.665)
  silkscreen extent -1.6,-1.4 1.6,1.4
LM1117-3.3 [mm]
  rect 1.575x0.672 smd: 1(0,0) 2(-2.55,1.598) 3(0,3)
  Top Layer region: -3.64,2.459 -1.785,2.459 -1.741,2.458 -1.696,2.455 -1.652,2.449 -1.608,2.442 -1.565,2.433 -1.522,2.421 -1.479,2.408 -1.437,2.393 -1.396,2.375 -1.356,2.356 -1.317,2.335 -1.279,2.312 -1.241,2.288 -1.206,2.261 -1.171,2.233 -1.138,2.204 -1.106,2.173 -1.075,2.14 -1.047,2.106 -1.019,2.071 -0.994,2.034 -0.97,1.996 -0.948,1.958 -0.928,1.918 -0.91,1.839 0.788,1.839 0.788,1.179 -0.91,1.179 -0.928,1.099 -0.948,1.06 -0.97,1.021 -0.994,0.983 -1.019,0.947 -1.047,0.911 -1.075,0.877 -1.106,0.845 -1.138,0.814 -1.171,0.784 -1.206,0.756 -1.241,0.73 -1.279,0.705 -1.317,0.682 -1.356,0.661 -1.396,0.642 -1.437,0.625 -1.479,0.609 -1.522,0.596 -1.565,0.585 -1.608,0.575 -1.652,0.568 -1.696,0.563 -1.741,0.56 -1.785,0.559 -3.64,0.559 -3.684,0.56 -3.728,0.563 -3.773,0.568 -3.817,0.575 -3.86,0.585 -3.903,0.596 -3.946,0.609 -3.988,0.625 -4.029,0.642 -4.069,0.661 -4.108,0.682 -4.146,0.705 -4.183,0.73 -4.219,0.756 -4.254,0.784 -4.287,0.814 -4.319,0.845 -4.349,0.877 -4.378,0.911 -4.405,0.947 -4.431,0.983 -4.455,1.021 -4.477,1.06 -4.497,1.099 -4.515,1.14 -4.531,1.181 -4.546,1.224 -4.558,1.266 -4.568,1.31 -4.577,1.353 -4.583,1.398 -4.587,1.442 -4.589,1.486 -4.589,1.531 -4.587,1.575 -4.583,1.62 -4.577,1.664 -4.568,1.708 -4.558,1.751 -4.546,1.794 -4.531,1.836 -4.515,1.877 -4.497,1.918 -4.477,1.958 -4.455,1.996 -4.431,2.034 -4.405,2.071 -4.378,2.106 -4.349,2.14 -4.319,2.173 -4.287,2.204 -4.254,2.233 -4.219,2.261 -4.183,2.288 -4.146,2.312 -4.108,2.335 -4.069,2.356 -4.029,2.375 -3.988,2.393 -3.946,2.408 -3.903,2.421 -3.86,2.433 -3.817,2.442 -3.773,2.449 -3.728,2.455 -3.684,2.458
  silkscreen extent -3.01,-0.83 -0.35,3.83
LQFP-48_L7.0-W7.0-P0.50-LS9.0-BL [mm]
  oval 0.27x1.5 smd mask+0.05: 1(-2.75,-4.25) 2(-2.25,-4.25) 3(-1.75,-4.25) 4(-1.25,-4.25) 5(-0.75,-4.25) 6(-0.25,-4.25) 7(0.25,-4.25) 8(0.75,-4.25) 9(1.25,-4.25) 10(1.75,-4.25) 11(2.25,-4.25) 12(2.75,-4.25) 25(2.75,4.25) 26(2.25,4.25) 27(1.75,4.25) 28(1.25,4.25) 29(0.75,4.25) 30(0.25,4.25) 31(-0.25,4.25) 32(-0.75,4.25) 33(-1.25,4.25) 34(-1.75,4.25) 35(-2.25,4.25) 36(-2.75,4.25)
  oval 1.5x0.27 smd mask+0.05: 13(4.25,-2.75) 14(4.25,-2.25) 15(4.25,-1.75) 16(4.25,-1.25) 17(4.25,-0.75) 18(4.25,-0.25) 19(4.25,0.25) 20(4.25,0.75) 21(4.25,1.25) 22(4.25,1.75) 23(4.25,2.25) 24(4.25,2.75) 37(-4.25,2.75) 38(-4.25,2.25) 39(-4.25,1.75) 40(-4.25,1.25) 41(-4.25,0.75) 42(-4.25,0.25) 43(-4.25,-0.25) 44(-4.25,-0.75) 45(-4.25,-1.25) 46(-4.25,-1.75) 47(-4.25,-2.25) 48(-4.25,-2.75)
  silkscreen extent -3.59,-4.46 3.3,3.34
LQFP-100_L14.0-W14.0-P0.50-LS16.0-BL [mm]
  oval 0.3x1.6 smd: 1(-6,-7.55) 2(-5.5,-7.55) 3(-5,-7.55) 4(-4.5,-7.55) 5(-4,-7.55) 6(-3.5,-7.55) 7(-3,-7.55) 8(-2.5,-7.55) 9(-2,-7.55) 10(-1.5,-7.55) 11(-1,-7.55) 12(-0.5,-7.55) 13(0,-7.55) 14(0.5,-7.55) 15(1,-7.55) 16(1.5,-7.55) 17(2,-7.55) 18(2.5,-7.55) 19(3,-7.55) 20(3.5,-7.55) 21(4,-7.55) 22(4.5,-7.55) 23(5,-7.55) 24(5.5,-7.55) 25(6,-7.55) 51(6,7.55) 52(5.5,7.55) 53(5,7.55) 54(4.5,7.55) 55(4,7.55) 56(3.5,7.55) 57(3,7.55) 58(2.5,7.55) 59(2,7.55) 60(1.5,7.55) 61(1,7.55) 62(0.5,7.55) 63(0,7.55) 64(-0.5,7.55) 65(-1,7.55) 66(-1.5,7.55) 67(-2,7.55) 68(-2.5,7.55) 69(-3,7.55) 70(-3.5,7.55) 71(-4,7.55) 72(-4.5,7.55) 73(-5,7.55) 74(-5.5,7.55) 75(-6,7.55)
  oval 1.6x0.3 smd: 26(7.55,-6) 27(7.55,-5.5) 28(7.55,-5) 29(7.55,-4.5) 30(7.55,-4) 31(7.55,-3.5) 32(7.55,-3) 33(7.55,-2.5) 34(7.55,-2) 35(7.55,-1.5) 36(7.55,-1) 37(7.55,-0.5) 38(7.55,0) 39(7.55,0.5) 40(7.55,1) 41(7.55,1.5) 42(7.55,2) 43(7.55,2.5) 44(7.55,3) 45(7.55,3.5) 46(7.55,4) 47(7.55,4.5) 48(7.55,5) 49(7.55,5.5) 50(7.55,6) 76(-7.55,6) 77(-7.55,5.5) 78(-7.55,5) 79(-7.55,4.5) 80(-7.55,4) 81(-7.55,3.5) 82(-7.55,3) 83(-7.55,2.5) 84(-7.55,2) 85(-7.55,1.5) 86(-7.55,1) 87(-7.55,0.5) 88(-7.55,0) 89(-7.55,-0.5) 90(-7.55,-1) 91(-7.55,-1.5) 92(-7.55,-2) 93(-7.55,-2.5) 94(-7.55,-3) 95(-7.55,-3.5) 96(-7.55,-4) 97(-7.55,-4.5) 98(-7.55,-5) 99(-7.55,-5.5) 100(-7.55,-6)
  silkscreen extent -7.03,-8 6.25,6.25
MICRO-USB-SMD_MICROXNJ [mm]
  rect 0.4x1.6 smd paste-100 mask+0.051: 1(-1.3,1.596) 2(-0.65,1.596) 3(0,1.596) 4(0.65,1.596) 5(1.3,1.596)
  round 1.3 hole 0.7: 6(2.425,1.074) 9(-2.425,1.074)
  oval 1.3x1.8 hole 0.7 slot 1.1 at 90 deg: 7(3.625,-1.596) 8(-3.625,-1.596)
  silkscreen extent -3.87,-4.24 3.93,1.71
POWERDI-123_L2.8-W1.8-LS3.7-RD [mm]
  rect 2.4x1.5 smd: 1(-1.187,0)
  rect 1.05x1.5 smd: 2(1.187,0)
  silkscreen extent -2,-1 1.2,1
QFN-24_L4.0-W4.0-P0.50-BL-EP2.6 [mm]
  rect 0.28x0.665 smd paste-100 mask+0.05: 1(-1.25,-1.908) 2(-0.75,-1.908) 3(-0.25,-1.908) 4(0.25,-1.908) 5(0.75,-1.908) 6(1.25,-1.908) 13(1.25,1.908) 14(0.75,1.908) 15(0.25,1.908) 16(-0.25,1.908) 17(-0.75,1.908) 18(-1.25,1.908)
  rect 0.665x0.28 smd paste-100 mask+0.05: 7(1.908,-1.25) 8(1.908,-0.75) 9(1.908,-0.25) 10(1.908,0.25) 11(1.908,0.75) 12(1.908,1.25) 19(-1.908,1.25) 20(-1.908,0.75) 21(-1.908,0.25) 22(-1.908,-0.25) 23(-1.908,-0.75) 24(-1.908,-1.25)
  rect 2.55x2.55 smd paste-100 mask+0.05: 25(0,0)
  silkscreen extent -2.08,-2.61 2.08,2.08
R0603 [mil]
  rect 32x32 smd: 1(-30,0) 2(30,0)
  silkscreen extent -55,-25 54,25
R0805 [mm]
  rect 1.1x1.4 smd: 1(-0.85,0) 2(0.85,0)
  silkscreen extent -1.65,-0.95 1.65,0.95
RES0603 [mil]
  rect 32x32 smd: 1(-30,0) 2(30,0)
  silkscreen extent -55,-25 54,25
RJ45-TH_HR911105A [mm]
  rect 1.6x1.6 hole 1: 1(-4.45,4.355)
  round 1.6 hole 1: 2(-3.18,6.895) 3(-1.91,4.355) 4(-0.64,6.895) 5(0.63,4.355) 6(1.9,6.895) 7(3.17,4.355) 8(4.44,6.895)
  round 1.8 hole 1.1: 9(-6.625,-6.895) 10(-4.085,-6.895) 11(4.085,-6.895) 12(6.625,-6.895)
  round 2.5 hole 1.8: SH1(-7.745,1.055) SH2(7.745,1.055)
  round 3.3 hole 3.3 unplated: ""(-5.715,-1.995) ""(5.715,-1.995)
  silkscreen extent -8.05,-12.92 8.05,8.68
SDM1210P005TF [mm]
  rect 1.485x2.781 smd: 1(-1.524,-0.549) 2(1.676,-0.549)
  silkscreen extent -2.59,-2.2 2.74,1.1
SMD-3225_4P [mm]
  rrect50% 1.4x1.2 smd: 1(-1.1,-0.85)
  rect 1.4x1.2 smd: 2(1.1,-0.85) 3(1.1,0.85) 4(-1.1,0.85)
  silkscreen extent -2.85,-2.45 2.2,1.85
SOP8W_L [mm]
  rect 1.4x0.6 smd: 1(-3.8,1.905)
  oval 1.4x0.6 smd: 2(-3.8,0.635) 3(-3.8,-0.635) 4(-3.8,-1.905) 5(3.8,-1.905) 6(3.8,-0.635) 7(3.8,0.635) 8(3.8,1.905)
  silkscreen extent -3.99,-2.67 2.54,2.74, body extent -3.94,-2.64 3.94,2.64, height 1.9
SOP-8P [mil]
  oval 24x80 smd: 1(-75,-115) 2(-25,-115) 3(25,-115) 4(75,-115) 5(75,115) 6(25,115) 7(-25,115) 8(-75,115)
  silkscreen extent -100,-65 100,65
SOT23 [mm]
  rect 0.8x0.9 smd: 1(0.95,1) 2(-0.95,1) 3(0,-1)
  silkscreen extent -1.45,-0.75 1.45,0.75
"SOT23 2301" [mm]
  rect 1x0.8 smd mask+0.051: 1(0,0) 2(0,1.9) 3(-2.3,0.95)
  silkscreen extent -1.85,-0.55 -0.45,2.45
SOT23-5 [mil]
  rect 20x50 smd: 1(-37.5,-50) 2(0,-50) 3(37.5,-50) 4(37.5,50) 5(-37.5,50)
  silkscreen extent -50,-15 50,15
SOT23-6 [mm]
  rect 0.55x1 smd: 1(0.95,1.35) 2(0,1.35) 3(-0.95,1.35) 4(-0.95,-1.35) 5(0,-1.35) 6(0.95,-1.35)
  silkscreen extent -1.5,-0.8 1.96,1.52
SOT363 [mm]
  rect 0.35x1 smd: 1(-0.65,-1.1) 2(0,-1.1) 3(0.65,-1.1) 4(0.65,1.1) 5(0,1.1) 6(-0.65,1.1)
  silkscreen extent -1.02,-0.45 1.02,0.45, body extent -1,-1.1 1,1.16, height 1
SWITCH [mm]
  oval 2.5x1 smd: 1(-3.734,2.177) 1(3.835,2.177) 2(-3.734,-2.184) 2(3.835,-2.184)
  silkscreen extent -3.08,-3.1 3.12,3.09, body extent -4.48,-3 4.52,3, height 8.95
TP_SIN [mil]
  rrect60% 50x50 smd: 1(0,0)
USB-A-TH_AF-WJDG [mm]
  round 1.7 hole 1.1: 1(-3.52,1.355) 2(-1.019,1.355) 3(0.98,1.355) 4(3.48,1.355)
  round 3.2 hole 2.3: 5(-6.57,-1.355) 5(6.57,-1.355)
  silkscreen extent -7.2,-11.65 7.2,2.46
USB-C-SMD_KH-TYPE-C-16P [mm]
  oval 1.2x2 hole 0.7 slot 1.7 at 90 deg: 1(-4.32,1.765) 2(4.32,1.765)
  oval 1.2x1.8 hole 0.7 slot 1.4 at 90 deg: 3(-4.32,-2.415) 4(4.32,-2.415)
  rect 0.3x1.3 smd: A1(-3.35,2.415) A4(-2.55,2.415) A5(-1.25,2.415) A6(-0.25,2.415) A7(0.25,2.415) A8(1.25,2.415) A9(2.55,2.415) A12(3.35,2.415) B1(3.05,2.415) B4(2.25,2.415) B5(1.75,2.415) B6(0.75,2.415) B7(-0.75,2.415) B8(-1.75,2.415) B9(-2.25,2.415) B12(-3.05,2.415)
  round 0.7 hole 0.7 unplated: ""(-2.89,1.235) ""(2.89,1.235)
  silkscreen extent -4.57,-5.08 4.57,0.57

## Part data
C1 C3 C6 C15 C35 C37 C54 C55 C59 C60 C61 C62: library part C0805, PCB DECAL=0805
C2 C4 C5 C16 C18 C23 C25 C26 C27 C28 C29 C30 C31 C32 C33 C34 C36 C38 C39 C40 C41 C42 C43 C44 C45 C46 C47 C48 C49 C50 C51 C52 C53 C58: library part C0603, PCB DECAL=0603
C7 C8 C9 C10 C11 C12 C13 C14 C17 C19 C20 C21 C22 C24: library part 贴片高压陶瓷电容, "Capacitor (Semiconductor SIM Model)", 器件封装(外观)=0603
C56: library part Cap, "Capacitor", Published=8-Jun-2000, Publisher="Altium Limited", Revision="July-2002: Re-released for DXP Platform."
C57: library part CAP, "Capacitor", LatestRevisionDate=17-Jul-2002, LatestRevisionNote="Re-released for DXP Platform.", PackageReference=RAD-0.3, Published=8-Jun-2000, Publisher="Altium Limited"
CN3: "Header, 4-Pin, Dual row", LatestRevisionDate=17-Jul-2002, LatestRevisionNote="Re-released for DXP Platform.", Publisher="Altium Limited"
CN4 CN5: "Header, 25-Pin, Dual row", LatestRevisionDate=17-Jul-2002, LatestRevisionNote="Re-released for DXP Platform.", Publisher="Altium Limited"
CN6: "Header, 10-Pin", LatestRevisionDate=17-Jul-2002, LatestRevisionNote="Re-released for DXP Platform.", Publisher="Altium Limited"
CN7 CN8: "Header, 8-Pin", LatestRevisionDate=17-Jul-2002, LatestRevisionNote="Re-released for DXP Platform.", Publisher="Altium Limited"
CN9: "Header, 6-Pin", LatestRevisionDate=17-Jul-2002, LatestRevisionNote="Re-released for DXP Platform.", Publisher="Altium Limited"
D1 D2 D3 D4: Average Rectified Current (Io)=1A, Forward Voltage (Vf@If)=310mV@1A, JLCPCB Part Class="Extended Part", LCSC Part Name="电压:30V 电流:1A", Manufacturer=DIODES(美台), Reverse Voltage (Vr)=30V, Add into BOM=yes, Convert to PCB=yes, Datasheet=https://atta.szlcsc.com/upload/public/pdf/source/20170427/1493286393645.pdf, Device=DFLS130L-7, Manufacturer Part=DFLS130L-7, Name=DFLS130L-7, Supplier=LCSC, Supplier Footprint=Power-DI-123, Supplier Part=C110493, Symbol=DFLS130L-7
ETH: library part HR911105A_C12074, Manufacturer=HANRUN, Contributor=13471635540, image=//image.lceda.cn/szlcsc/C12074.jpg, Manufacturer Part=HR911105A, spicePre=J, spiceSymbolName=HR911105A_C12074, Supplier=LCSC, Supplier Part=C12074
FUSE1: library part SMD1210P005TF, "https://item.szlcsc.com/947797.html?fromZone=s_s__%25226V%2520500mA%2522", ComponentLink1Description=lichang, ComponentLink1URL=C883122
JP4 JP5 JP6 JP7: library part CON2_DIP
K1 K2 K3: BOM_JLCPCB Part Class="Extended Part", BOM_Manufacturer=HYP, BOM_Manufacturer Part=1TS002B-2600-5001_KEY, BOM_Supplier=LCSC, BOM_Supplier Part=C319334, Contributor=LCSC, spicePre=S, spiceSymbolName=1TS002B-2600-5001
L1 L2: "SMD Chip ferrite bead, 600R@100MHz +/-25%, 350mA, 500mohm DC, 0603, T=0.8mm", Manufacturer=TAI-TECH, Manufacturer_Part_Number=FCM1608KF-601T03, ComponentLink1Description=Datasheet, ComponentLink1URL=http://tunmcdsvn.tun.st.com/Component_Datasheet_Library/Trunk/Inductors/TaiTech_Bead_FCM1608_series, ECCN_EU=n/a, ECCN_US=n/a, Internal_Part_Number=MCD-00047, Part_Type=Inductor, Provided_By=SUBCO, Status=Released
L3 L4 R1 R2 R3 R4 R5 R6 R7 R8 R9 R10 R11 R12 R13 R14 R16 R17 R18 R19 R20 R21 R22 R23 R24 R25 R26 R27 R28 R29 R30 R31 R32 R33 R34 R35 R36 R37 R38 R39 R40 R41 R42 R43 R44 R45 R46 R47 R48 R49 R50 R51 R52 R53 R54 R55 R56 R57 R58 R59 R60 R61 R62 R63 R64 R65 R66 R67 R68 R69 R70 R71 R72 R73 R74 R75 R76 R77 R78 R79 R80 R81 R82 R83 R84 R85 R86 R87 R88 R89 R90 R91 R92 R93 R94 R95 R96 R98 R99 R100 R101 R102 R103 R104 R105 R106 R107 R108 R109 R110 R111 R112 R113 R114 R115 R116 R117 R118: library part R0603, PCB DECAL=0603
LED1: JLCPCB Part Class=扩展库, LCSC Part Name=RGB三色, Manufacturer=MEIHUA(美华), Add into BOM=yes, Convert to PCB=yes, Datasheet=https://atta.szlcsc.com/upload/public/pdf/source/20190902/C409779_9EA0C46D876E94D2A4E683BAC3DDD702.pdf, Device=MHPA3528RGBCT, Manufacturer Part=MHPA3528RGBCT, Name=MHPA3528RGBCT, Supplier=LCSC, Supplier Footprint=SMD3528, Supplier Part=C409779, Symbol=MHPA3528RGBCT
LED2 LED3: library part PDI-E803_Dup1
Q1: library part "MOSFET N", "MOSFET N", 器件封装(外观)=SOT23
Q2 Q3: library part "MOSFET P", "MOSFET P", 器件封装(外观)=SOT23
R15 R97: library part R0805, PCB DECAL=0805
U3 U4: library part ESDALC6V1W5, "Dual Transil array for ESD protection", Manufacturer=STMICROELECTRONICS, ComponentLink1Description=STM_ESD_ESDALC6V1W5.pdf, ComponentLink1URL=http://tunmcdsvn.tun.st.com/Component_Datasheet_Library/Trunk/Diodes/STM_ESD_ESDALC6V1W5, ECCN_EU=NEC, ECCN_US=EAR99, Initial_Board_Reference=MB1262, Internal_Part_Number=MCD-00136, Manufacturer_Part_Number=ESDALC6V1W5, Part_Type=Diode, Provided_By=Subcon, Status=Released
U11 U19 U20: "ESD protection 6V1", Manufacturer=STMICROELECTRONICS, Manufacturer_Part_Number=ESDALC6V1-1U2, ComponentLink1Description=STM_ESD_ESDALC6V1-1U2.pdf, ComponentLink1URL=http://tunmcdsvn.tun.st.com/Component_Datasheet_Library/Trunk/Diodes/STM_ESD_ESDALC6V1-1U2, ECCN_EU=NEC, ECCN_US=EAR99, Initial_Board_Reference=MB1274, Internal_Part_Number=MCD-00170, Part_Type=Diode, Provided_By=Subcon, Status=Released
U15: "LQFP48", BOM_Manufacturer=PUYA(普冉), BOM_Manufacturer Part=PY32F403C1xT, spicePre=U, spiceSymbolName=PY32F403C1xT
U17: library part SST25VF010, "SST25VF010", 器件封装(外观)=SOP8
U18: "LQFP100", BOM_Manufacturer=PUYA(普冉), BOM_Manufacturer Part=PY32E407Vx, spicePre=U, spiceSymbolName=PY32E407Vx
U21: library part W25Q256, "外置flash"
U22: "立创 C45223", JLCPCB Part Class="Extended Part", Manufacturer=MICROCHIP(美国微芯), Operating Temperature=0℃~+85℃, Supply Voltage=1.6V~3.6V, Add into BOM=yes, Application Function=以太网收发器, Convert to PCB=yes, Datasheet=https://atta.szlcsc.com/upload/public/pdf/source/20151012/1457707444106.pdf, Device=LAN8720A-CP-TR, Interface=RMII, LCSC Part Name=LAN8720A-CP-TR, Manufacturer Part=LAN8720A-CP-TR, Name=LAN8720A-CP-TR, Number of Channels=1, Supplier=LCSC, Supplier Footprint=QFN-24-EP(4x4), Supplier Part=C45223, Symbol=LAN8720A-CP-TR
USB: BOM_JLCPCB Part Class="Extended Part", BOM_Manufacturer="Shenzhen Kinghelm Elec", BOM_Manufacturer Part=KH-TYPE-C-16P, BOM_Supplier=LCSC, BOM_Supplier Part=C709357, Contributor=LCSC, spicePre=U, spiceSymbolName=KH-TYPE-C-16P
USB1 USB2: library part MicroXNJ, Current Rating - Power (Max)=1A, JLCPCB Part Class="Extended Part", LCSC Part Name="Micro-B 母 卧贴", Manufacturer="SHOU HAN(首韩)", Operating Temperature Range=-20℃~+85℃, Add into BOM=yes, Connector Type=Micro-B, Convert to PCB=yes, Datasheet=https://atta.szlcsc.com/upload/public/pdf/source/20220415/2494EDFF499AF6F852F7C820374B6AF3.pdf, Device=MicroXNJ, Gender=母, Manufacturer Part=MicroXNJ, Mounting Style=卧贴, Name=MicroXNJ, Number of Contacts=5P, Number of Ports=1, Standard="USB 2.0", Supplier=LCSC, Supplier Footprint=SMD, Supplier Part=C404969, Symbol=MICROXNJ
USB1_HOST: library part "AF 90° WJDG", Current Rating - Power (Max)=1.5A, JLCPCB Part Class="Extended Part", LCSC Part Name="Type-A 母 弯插", Manufacturer="SHOU HAN(首韩)", Operating Temperature Range=-25℃~+85℃, Add into BOM=yes, Connector Type=Type-A, Convert to PCB=yes, Datasheet=https://atta.szlcsc.com/upload/public/pdf/source/20191113/C456018_B104E062BEB8E11E57E63560E04EE13A.pdf, Device="AF 90° WJDG", Gender=母, Manufacturer Part="AF 90° WJDG", Mounting Style=弯插, Name="AF 90° WJDG", Number of Contacts=4P, Number of Ports=1, Standard="USB 2.0", Supplier=LCSC, Supplier Footprint=插件, Supplier Part=C456018, Symbol="AF 90° WJDG"
Y1: library part ABM8AIG-24.000MHZ-82Z-T, "±20ppm , 12.5pF , T_use: -40°C~125°C", Equivalent Series Resistance (ESR)=50Ω, External load capacitor=8pF, Frequency Stability(Full temperature range)=±50ppm, JLCPCB Part Class="Extended Part", LCSC Part Name="24MHz ±20ppm 8pF", Manufacturer=ABRACON, Normal temperature Frequency Tolerance=±20ppm, Operating Temperature=-40℃~+125℃, Add into BOM=yes, Convert to PCB=yes, Datasheet=https://atta.szlcsc.com/upload/public/pdf/source/20210326/C1986479_1F0B0D93791ADB7A90489BA856D17A98.pdf, Device=ABM8AIG-24.000MHZ-82Z-T, Manufacturer Part=ABM8AIG-24.000MHZ-82Z-T, Name=24MHz, Supplier=LCSC, Supplier Footprint=SMD3225-4P, Supplier Part=C1669761, Symbol=ABM8AIG-24.000MHZ-82Z-T
Y2: library part ABM8AIG-24.000MHZ-82Z-T, "±20ppm , 12.5pF , T_use: -40°C~85°C  C2682775", Equivalent Series Resistance (ESR)=50Ω, External load capacitor=8pF, Frequency Stability(Full temperature range)=±50ppm, JLCPCB Part Class="Extended Part", LCSC Part Name="24MHz ±20ppm 8pF", Manufacturer=ABRACON, Normal temperature Frequency Tolerance=±20ppm, Operating Temperature=-40℃~+125℃, Add into BOM=yes, Convert to PCB=yes, Datasheet=https://atta.szlcsc.com/upload/public/pdf/source/20210326/C1986479_1F0B0D93791ADB7A90489BA856D17A98.pdf, Device=ABM8AIG-24.000MHZ-82Z-T, Manufacturer Part=ABM8AIG-24.000MHZ-82Z-T, Name=24MHz, Supplier=LCSC, Supplier Footprint=SMD3225-4P, Supplier Part=C1669761, Symbol=ABM8AIG-24.000MHZ-82Z-T
Y3: library part XKXGI-SUA-32.768K, "±20ppm , 12.5pF , T_use: -40°C~125°C", External load capacitor=12.5pF, Frequency Stability(Full temperature range)=±30ppm, JLCPCB Part Class="Extended Part", LCSC Part Name="32.768kHz ±20ppm 12.5pF YST310S", Manufacturer=YXC(扬兴晶振), Normal temperature Frequency Tolerance=±20ppm, Operating Temperature=-40℃~+85℃, Add into BOM=yes, Convert to PCB=yes, Crystal Type=贴片晶振, Datasheet=https://atta.szlcsc.com/upload/public/pdf/source/20240329/3A7650FD985DD0DE85694D3785AB4916.pdf, Device=XKXGI-SUA-32.768K, Manufacturer Part=XKXGI-SUA-32.768K, Name=32.768kHz, Supplier=LCSC, Supplier Footprint=SMD3215-2P, Supplier Part=C5213671, Symbol=XKXGI-SUA-32.768K
Y4: library part 12MHz, BOM_LCSC Assembly=Yes, BOM_Manufacturer=TAE, BOM_Manufacturer Part=SMD-3225_4P12M20pf10ppm, BOM_Supplier=LCSC, BOM_Supplier Part=C133334, Contributor=LCSC, nameAlias=Frequency, SMT Type=Extend, spicePre=X, spiceSymbolName=SMD-3225_4P12M20PF10PPM
CN1 CN10 JP3: PCB DECAL=CON5x2
U6: Function="ESD EMI fliter"

## Free pads (board coordinates)
  round 137.8 hole 125.98: 0(965.02,2533.76) 0(969.33,-4.92) 0(4148,-39.3) 0(4148,2568.14)
  round 125.98 hole 125.98 unplated: 0(1560.11,316.55) 0(1610.11,2216.55) 0(3610.11,1616.55)

## Via types
v1: diameter 22, hole 12, Top Layer to Bottom Layer, tented both sides, 393 vias
v2: diameter 16, hole 8, Top Layer to Bottom Layer, tented both sides, 115 vias
v3: diameter 20, hole 10, Top Layer to Bottom Layer, tented both sides, 54 vias
v4: diameter 16, hole 9, Top Layer to Bottom Layer, tented both sides, 41 vias
v5: diameter 30, hole 15, Top Layer to Bottom Layer, tented both sides, 16 vias
v6: diameter 20, hole 10, Top Layer to Bottom Layer, 9 vias
v7: diameter 15, hole 8, Top Layer to Bottom Layer, tented both sides, 5 vias
v8: diameter 16, hole 8, Top Layer to Bottom Layer, 3 vias
v9: diameter 20, hole 12, Top Layer to Bottom Layer, tented both sides, 1 vias

## Nets (pads, with @x,y where several pads share a name; then routed paths per layer and width w, separated by ;. In a path a pad name is that pad's centre, name@x,y a point inside that pad or via, vN(x,y) a via of type N, cw(c..) or ccw(c..) an arc to the next point about the centre after c; other vN are vias at no path point)
3.3V_OUT_EN: R23.1 U15.46 | length 821.7
  Top Layer w6: U15.46@88.18,1106.6 88.82,1107.24 126.39,1107.24 137.81,1118.66 v4(137.81,1139.74) ; v4(405,1735) 405,1770 R23.1@405.5,1770.5
  Bottom Layer w6: v4(137.81,1139.74) 132.55,1145 132.55,1167.65 405,1440.09 v4(405,1735)
3V3: C55.2 C56.2 CN7.4 JP4.1 U23.2 | length 355.6
  Top Layer w30: U23.2@1543.38,844.2 1543.38,976.71 C55.2@1538,982.09 1538,1102.09 JP4.1@1605.5,1169.59
3V3_PYLK: C1.2 C2.2 C7.2 C8.2 C9.2 C10.2 C17.2 C19.2 C20.2 C21.2 C22.2 CN2.2 LED1.1 R14.2 R26.1 R34.2 R35.2 U1.1 U2.1 U5.1 U7.1 U8.1 U9.2 U10.1 U12.1 U13.5 U14.1 U15.9 U15.24 U15.48 U17.3 U17.7 U17.8 | length 3629.2
  Top Layer w11: U15.9@304.71,1008.18 304.71,971.07 430.5,845.28 C21.2@430.5,806.5 ; 400.22,878.06 439.59,917.43 v1(439.59,919.91)
  Top Layer w12: U7.1@-43.78,515.38 -21.19,492.79 47.4,492.79 136.82,492.79 ; 46.56,493.63 U8.1@46.56,531.35 ; U10.1@136.82,531.26 136.82,492.79 ; C7.2@207.6,624.9 227.25,605.25 U5.1@227.25,531.35 227.25,510.19 209.85,492.79 136.82,492.79 ; U2.1@317.59,531.35 317.59,503.28 331.87,489 386.52,489 407.93,510.42 U12.1@407.93,531.35 ; U14.1@588.62,531.35 588.62,577.71 C8.2@647,636.09 685,636.09 v1(687,638.09) ; R35.2@648,1013 685.6,1013 v1(686.1,1012.5)
  Top Layer w15: v1(-197,725.89) -196.61,725.5 R26.1@-149.5,725.5 ; v1(-158.9,776.09) -131.59,776.09 -88.5,819.19 C22.2@-88.5,825.5 -74.09,825.5 66.9,966.49 66.9,1067.23 U15.48@88.18,1067.23 ; C20.2@-150.5,675.5 R26.1@-150.5,724.5 ; U7.1@-43.78,515.38 U7.1@-43.78,531.35 ; C9.2@46.3,624.9 46.56,624.64 U8.1@46.56,531.35 ; R14.2@80.5,2105.5 80.5,2150.82 v1(80.72,2151.04) ; v1(206.64,648.09) 206.76,647.97 206.76,635.94 212.7,630 C7.2@207.6,624.9 ; U15.24@400.85,1285.9 434.6,1285.9 v1(456.5,1307.8) 518,1369.3 C19.2@585,1369.3 ; U12.1@407.93,531.35 407.93,623.47 C10.2@406.5,624.9 425.31,624.9 v1(440.19,639.78) ; U1.1@498.28,531.35 498.28,516.52 522.11,492.68 573.14,492.68 588.62,508.16 U14.1@588.62,531.35
  Top Layer w25: U17.3@-139.3,1242.5 -139.3,1106.86 -89.3,1056.86 U17.7@-89.3,1012.5 U17.8@-39.3,1012.5 ; v1(-137.88,2656.31) -137.88,2619.43 LED1.1@-137.31,2618.86 ; C2.2@380.5,2044.5 443,2044.5 455.5,2032 C1.2@455.5,2030.5 C1.2@460.88,2025.12
  Top Layer w30: U13.5@230.5,1875.5 230.5,1919.49 267.73,1956.72 400.16,1956.72 ; C1.2@460.88,2025.12 U9.2@592.6,2025.12
  Bottom Layer w12: v1(456.5,1307.8) 466.1,1307.8 642,1131.9 642,1056.6 v1(686.1,1012.5)
  Bottom Layer w25: C17.2@-138,1088 -138.75,1088.75 v1(-138.75,1125.3) -139.21,1125.76 -139.21,1160.79 R34.2@-137,1163
  other v1: 434.3,1933.2 381.6,1937.1 469.5,1968.5 415.3,1972.4 364.5,1985.6
3V3_USB_PYLK: C6.2 JP1.1 U13.1 | length 609.7
  Top Layer w25: U13.1@230.5,1775.5 230.5,1725.08 280.08,1675.5 280.5,1675.5 293,1663 293,1654.21 305.5,1641.71 334.74,1641.71 389.5,1586.96 389.5,1521.63 435.63,1475.5 JP1.1@643,1475.5
5V: C54.2 C57.2 C59.2 C61.2 CN3.2 CN7.5 D1.1 D2.1 D3.1 D4.1 U23.3 U24.5 U25.5 USB1_HOST.1 | length 2151.8
  Top Layer w25: C54.2@1443,662.09 C54.2@1460.5,644.59 ; C57.2@1443,717.09 C57.2@1445.5,719.59
  Top Layer w30: U24.5@3910.58,443.46 3911.27,444.16 3990.4,444.16 C59.2@3991.1,444.85 3991.1,449.85 v5(4055.79,514.54) ; v5(4056.92,847.91) 4071.31,833.52 4108.51,833.52 4118.51,823.52 C61.2@4118.51,818.52 4118.93,818.94 4196.65,818.94 U25.5@4197.07,819.36
  Top Layer w60: D1.1@1327.25,907.09 D2.1@1327.25,819.59 D4.1@1327.25,732.09 D3.1@1327.25,644.59 1393.88,644.59 ; v5@1393.88,524.52 1393.88,644.59 ; C54.2@1443,662.09 1443,717.09 U23.3@1443,788.98 ; C54.2@1460.5,644.59 1393.88,644.59
  Bottom Layer w30: v5(4056.92,847.91) 4056.92,515.67 v5(4055.79,514.54) 4214.58,514.54 v5(4216.6,516.56) 4217.9,516.56 4381.29,353.17 4381.29,76.39 4431.19,26.49 USB1_HOST.1@4503.65,26.49
  other v5: 1396.39,522.01
5V_OUT_EN: R28.1 U15.11 | length 930.4
  Top Layer w6: U15.11@344.08,1008.18 U15.11@344.08,1008.37 344.08,1068.17 347.88,1071.97 v4(347.88,1074.67) ; v4(592.5,1688.59) 652.92,1749.01 652.92,1767.92 R28.1@655.5,1770.5
  Bottom Layer w6: v4(347.88,1074.67) 347.88,1154.99 300.71,1202.16 300.71,1276.81 592.5,1568.59 v4(592.5,1688.59)
5V_USB1_START: 5V_USB1.1 C60.2 JP6.1 R89.2 U24.1 USB1.1 | length 1053.7
  Top Layer w6: R89.2@4360.5,604.63 4527.77,604.63 v5(4562.72,639.58)
  Top Layer w15: 5V_USB1.1@4487.04,973.85 4488.25,972.64 4499.03,961.86 v3(4499.03,924.39)
  Top Layer w25: v1(4739.6,712.69) USB1.1@4765.65,738.74
  Top Layer w30: v5(3701.06,622.25) 3795.2,528.11 3795.2,523.11 3805.2,513.11 C60.2@3810.2,513.11 3810.39,512.92 3810.39,443.65 U24.1@3810.58,443.46
  Bottom Layer w15: v3(4499.03,924.39) 4498.7,924.06 4498.7,703.6 v5(4562.72,639.58)
  Bottom Layer w25: v5(4562.72,639.58) 4564.2,641.07 4667.97,641.07 v1(4739.6,712.69)
5V_USB2_START: 5V_USB2.1 C62.2 JP7.1 R96.2 U25.1 USB2.1 | length 793.9
  Top Layer w15: 5V_USB2.1@4479.3,1078.69 4519.18,1038.81 4557.37,1038.81
  Top Layer w25: v5(4222.31,731.55) 4236.5,745.74 C62.2@4296.44,745.74 4296.75,746.06 4296.75,819.05 U25.1@4297.07,819.36 ; 4557.37,1038.81 USB2.1@4770.08,1251.52 ; v5(4557.8,836.33) 4557.8,1039.24
  Bottom Layer w6: R96.2@2122.8,707.59 R96.2@2124.2,706.19
  Bottom Layer w15: v2(2083.7,708.99) 2085.1,707.59 R96.2@2122.8,707.59
5V_USB_CHGR: 5V_USB.1 C3.2 C4.2 FUSE1.2 U9.3 U16.5 | length 771.5
  Top Layer w15: 5V_USB.1@396.1,2274.79 534.79,2274.79 537.39,2277.39 C3.2@548,2288
  Top Layer w30: U16.5@480.5,1875.5 480.5,1888.6 v5(518.78,1926.88) ; U9.3@537.39,2125.5 C3.2@537.39,2277.39 ; C3.2@548,2288 556.89,2296.89 556.89,2370.28 571.12,2384.52 FUSE1.2@596.39,2384.52
  Bottom Layer w30: v5(518.78,1926.88) 537.08,1945.18 v5(537.08,2182.9)
5V_USB_PYLK: C15.2 D1.2 JP1.3 U16.1 | length 2053.4
  Top Layer w25: C15.2@468,1658 C15.2@480.5,1658
  Top Layer w30: C15.2@468,1658 474.98,1664.98 U16.1@474.98,1785.62 ; C15.2@480.5,1658 625.5,1658 JP1.3@643,1675.5 643,1675.9 699.2,1732.09 699.2,1925.85 729.39,1956.04 801.05,1956.04 843,1914.09 843,1657.09 899.21,1600.88 1111.79,1600.88 1184.47,1528.2 1184.47,956.38 D1.2@1233.75,907.09
AD_TVDD: R16.1 R20.2 U15.19 | length 200
  Top Layer w6: U15.19@422.82,1185.34 R20.2@572.84,1185.34 ; R20.2@588,1188 R16.1@588,1238
DIR_RESET: U10.5 U15.3 | length 771.5
  Top Layer w6: v3@-9.1,703.47 -9.1,778.02 186.6,973.72 U15.3@186.6,1008.37 ; v3@110.4,399.79 111.31,400.71 U10.5@111.31,444.73
  Bottom Layer w6: v3(-8.68,698.63) 8.38,681.57 8.38,510.32 v3(110.8,407.89)
DIR_RTCK_DTR: U5.5 U15.4 | length 840.5
  Top Layer w6: v3@16.8,746.13 16.8,780.3 206.29,969.79 U15.4@206.29,1008.37 ; v3@200.9,405.19 201.28,405.57 201.28,444.36 U5.5@201.66,444.73 U5.5@201.66,463.18
  Bottom Layer w6: v3(18,744.79) 24.43,738.36 24.43,533.26 103.3,454.39 158.5,454.39 v3(201.3,411.59)
DIR_TCK_SWCLK: U2.5 U15.21 | length 1201.9
  Top Layer w6: v4(288.97,487.38) 292,484.35 U2.5@292,444.73 ; v4(311.14,1156.92) 311.14,1158.68 377.17,1224.71 U15.21@422.82,1224.71
  Bottom Layer w6: v4(288.97,487.38) 287.69,486.09 109.4,486.09 40.65,554.84 40.65,930.45 267.13,1156.92 v4(311.14,1156.92)
DIR_TDI_VCP_TX: U12.5 U15.20 | length 923.6
  Top Layer w6: v4(370.66,1189.06) 386.83,1205.22 U15.20@422.63,1205.22 ; U12.5@382.34,444.73 382.34,462.04 406.1,485.79 v4@416.2,485.79
  Bottom Layer w6: v4(370.66,1189.06) 513.86,1045.86 513.86,758.09 415.58,659.81 v4(415.58,485.18)
DIR_TDO_SWO: U7.5 U15.43 | length 905.8
  Top Layer w6: v4(-72.3,482) -70.84,480.54 -70.84,446.2 U7.5@-69.37,444.73 ; U15.43@88.37,1165.85 160.54,1165.85 v4(176.8,1149.59)
  Bottom Layer w6: v4(-72.3,482) -74.03,483.73 -74.03,869.81 176.8,1120.64 v4(176.8,1149.59)
DIR_TMS_SWDIO: U1.5 U15.14 | length 782.4
  Top Layer w6: U15.14@422.82,1086.92 479.5,1086.92 518,1048.42 518,684 428.46,594.46 428.46,503.7 443.39,488.77 464.24,488.77 472.69,480.32 U1.5@472.69,444.73
DIR_TRST_RTS: U8.5 U15.2 | length 765
  Top Layer w6: v3(-47.6,761.69) 166.92,976.21 U15.2@166.92,1008.37 ; U8.5@20.97,444.73 20.97,404.42 v3@21.14,404.26
  Bottom Layer w6: v3(-47.6,761.69) -55.3,753.99 -55.3,504.39 20.9,428.19 v3(20.9,407.49)
DIR_VCP_RX: U14.5 U15.22 | length 1486.9
  Top Layer w6: v4(284.56,1124.93) 284.56,1163.3 365.66,1244.4 U15.22@422.82,1244.4 ; v4(563.03,408.08) U14.5@563.03,444.73
  Bottom Layer w6: v4(284.56,1124.93) 259.03,1124.93 56.81,922.7 56.81,565.69 86.8,535.69 330.6,535.69 441.3,424.99 546.11,424.99 v4(563.03,408.08)
E_5V: CN11.1 D2.2 | length 2248
  Top Layer w30: v5(907.01,841.78) 929.2,819.59 D2.2@1233.75,819.59
  Bottom Layer w30: v5(907.01,841.78) 843,905.79 843,1994.59 1283.95,2435.55 CN11.1@1393.11,2435.55
ESMC_CLK: R44.1 R51.1 U21.6 | length 1883.4
  Top Layer w6: U21.6@1368,1456.7 1368,1440.83 1399.02,1409.81 v2(1561.29,1409.81)
  Bottom Layer w6: v2(1561.29,1409.81) 1871.14,1719.66 2312.45,1719.66 2417,1615.11 2417,1396.7 ; R51.1@2205,1109.3 2417,1321.3 2417,1396.7 ; R44.1@2456.1,1399.9 2420.2,1399.9 2417,1396.7
ESMC_CS: R43.1 R50.1 R90.1 U21.1 | length 2156.5
  Top Layer w6: U21.1@1268,1157.49 1276.81,1166.3 1276.81,1182.05 1277.72,1182.05 1308.51,1212.84 v2(1322.71,1212.84)
  Bottom Layer w6: R90.1@1292.5,1212.5 1292.84,1212.84 v2(1322.71,1212.84) 1847.2,1737.33 2317.84,1737.33 2531.43,1523.74 2531.43,1429.13 2495.9,1393.6 2495.9,1370.9 2263.99,1138.99 2263.99,1118.99 R43.1@2262.5,1117.5 ; R43.1@2258.5,1110.3 R43.1@2258.5,1117.5
ESMC_IO0: R47.1 R52.1 U21.5 | length 1938.3
  Top Layer w6: U21.5@1418,1467.68 1423.2,1472.88 1438.16,1472.88 v7(1439.88,1474.6)
  Bottom Layer w6: v7(1439.88,1474.6) 1773.28,1807.99 2336.1,1807.99 2596.44,1547.65 2596.44,1362.94 2521.2,1287.7 2521.2,1115.5 2519.7,1114 R47.1@2474.1,1114
ESMC_IO1: R46.1 R53.1 U21.2 | length 2164.6
  Top Layer w6: U21.2@1318,1157.49 1321.38,1160.86 1321.38,1175.88 1351.22,1205.72 v2(1351.22,1277.54)
  Bottom Layer w6: v2(1351.22,1277.54) 1351.22,1278.61 1827.6,1754.99 2323.65,1754.99 2446.01,1632.63 2548.99,1529.65 2548.99,1389.29 2362.5,1202.8 R46.1@2362.5,1117.5 ; R53.1@2312.5,1110.4 2363.7,1110.4 R46.1@2364.2,1109.9
ESMC_IO2: R48.1 R55.1 U21.3 | length 2131.3
  Top Layer w6: U21.3@1368,1157.49 1368,1175.68 1377.89,1185.56 v2(1377.89,1374.34)
  Bottom Layer w6: R48.1@1292.5,1362.5 1304.34,1374.34 v2(1377.89,1374.34) 1793.87,1790.33 2331,1790.33 2580.18,1541.15 2580.18,1372.88 2475.99,1268.69 2475.99,1243.49 R55.1@2475,1242.5
ESMC_IO3: R49.1 R56.1 U21.7 | length 2192.8
  Top Layer w6: U21.7@1318,1456.7 1321.37,1453.33 1321.37,1439.13 1365.81,1394.69 1418.36,1394.69 1423.57,1389.48 v2(1426.28,1389.48)